# Allegro board 0010.brd
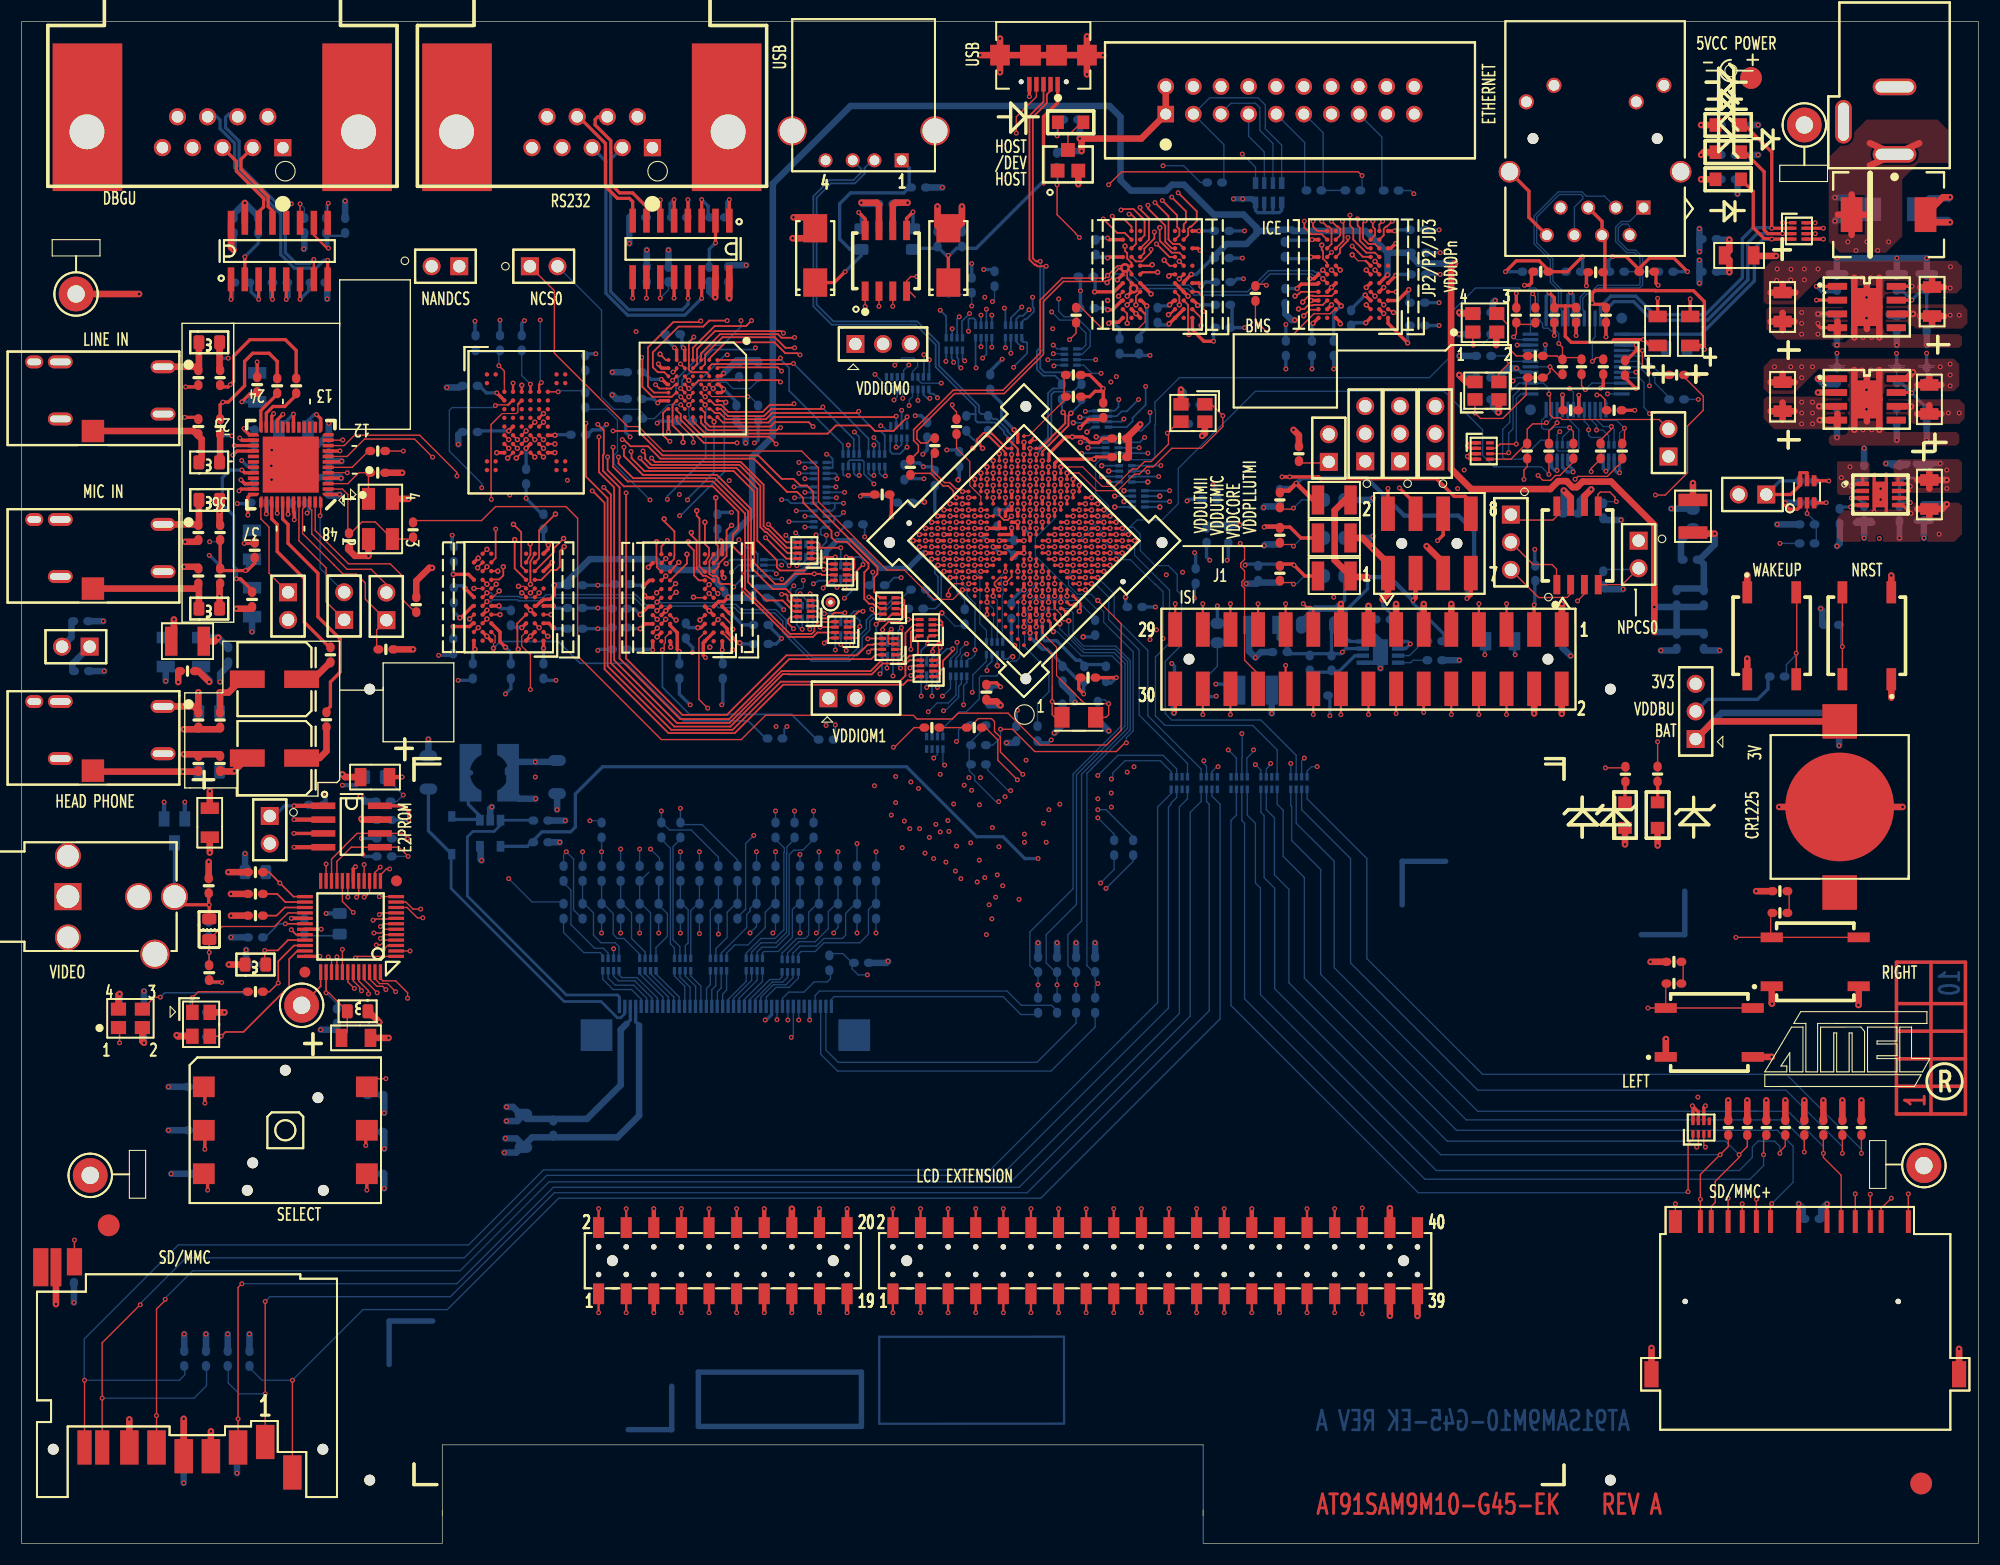
[diagram p0: board, top side]
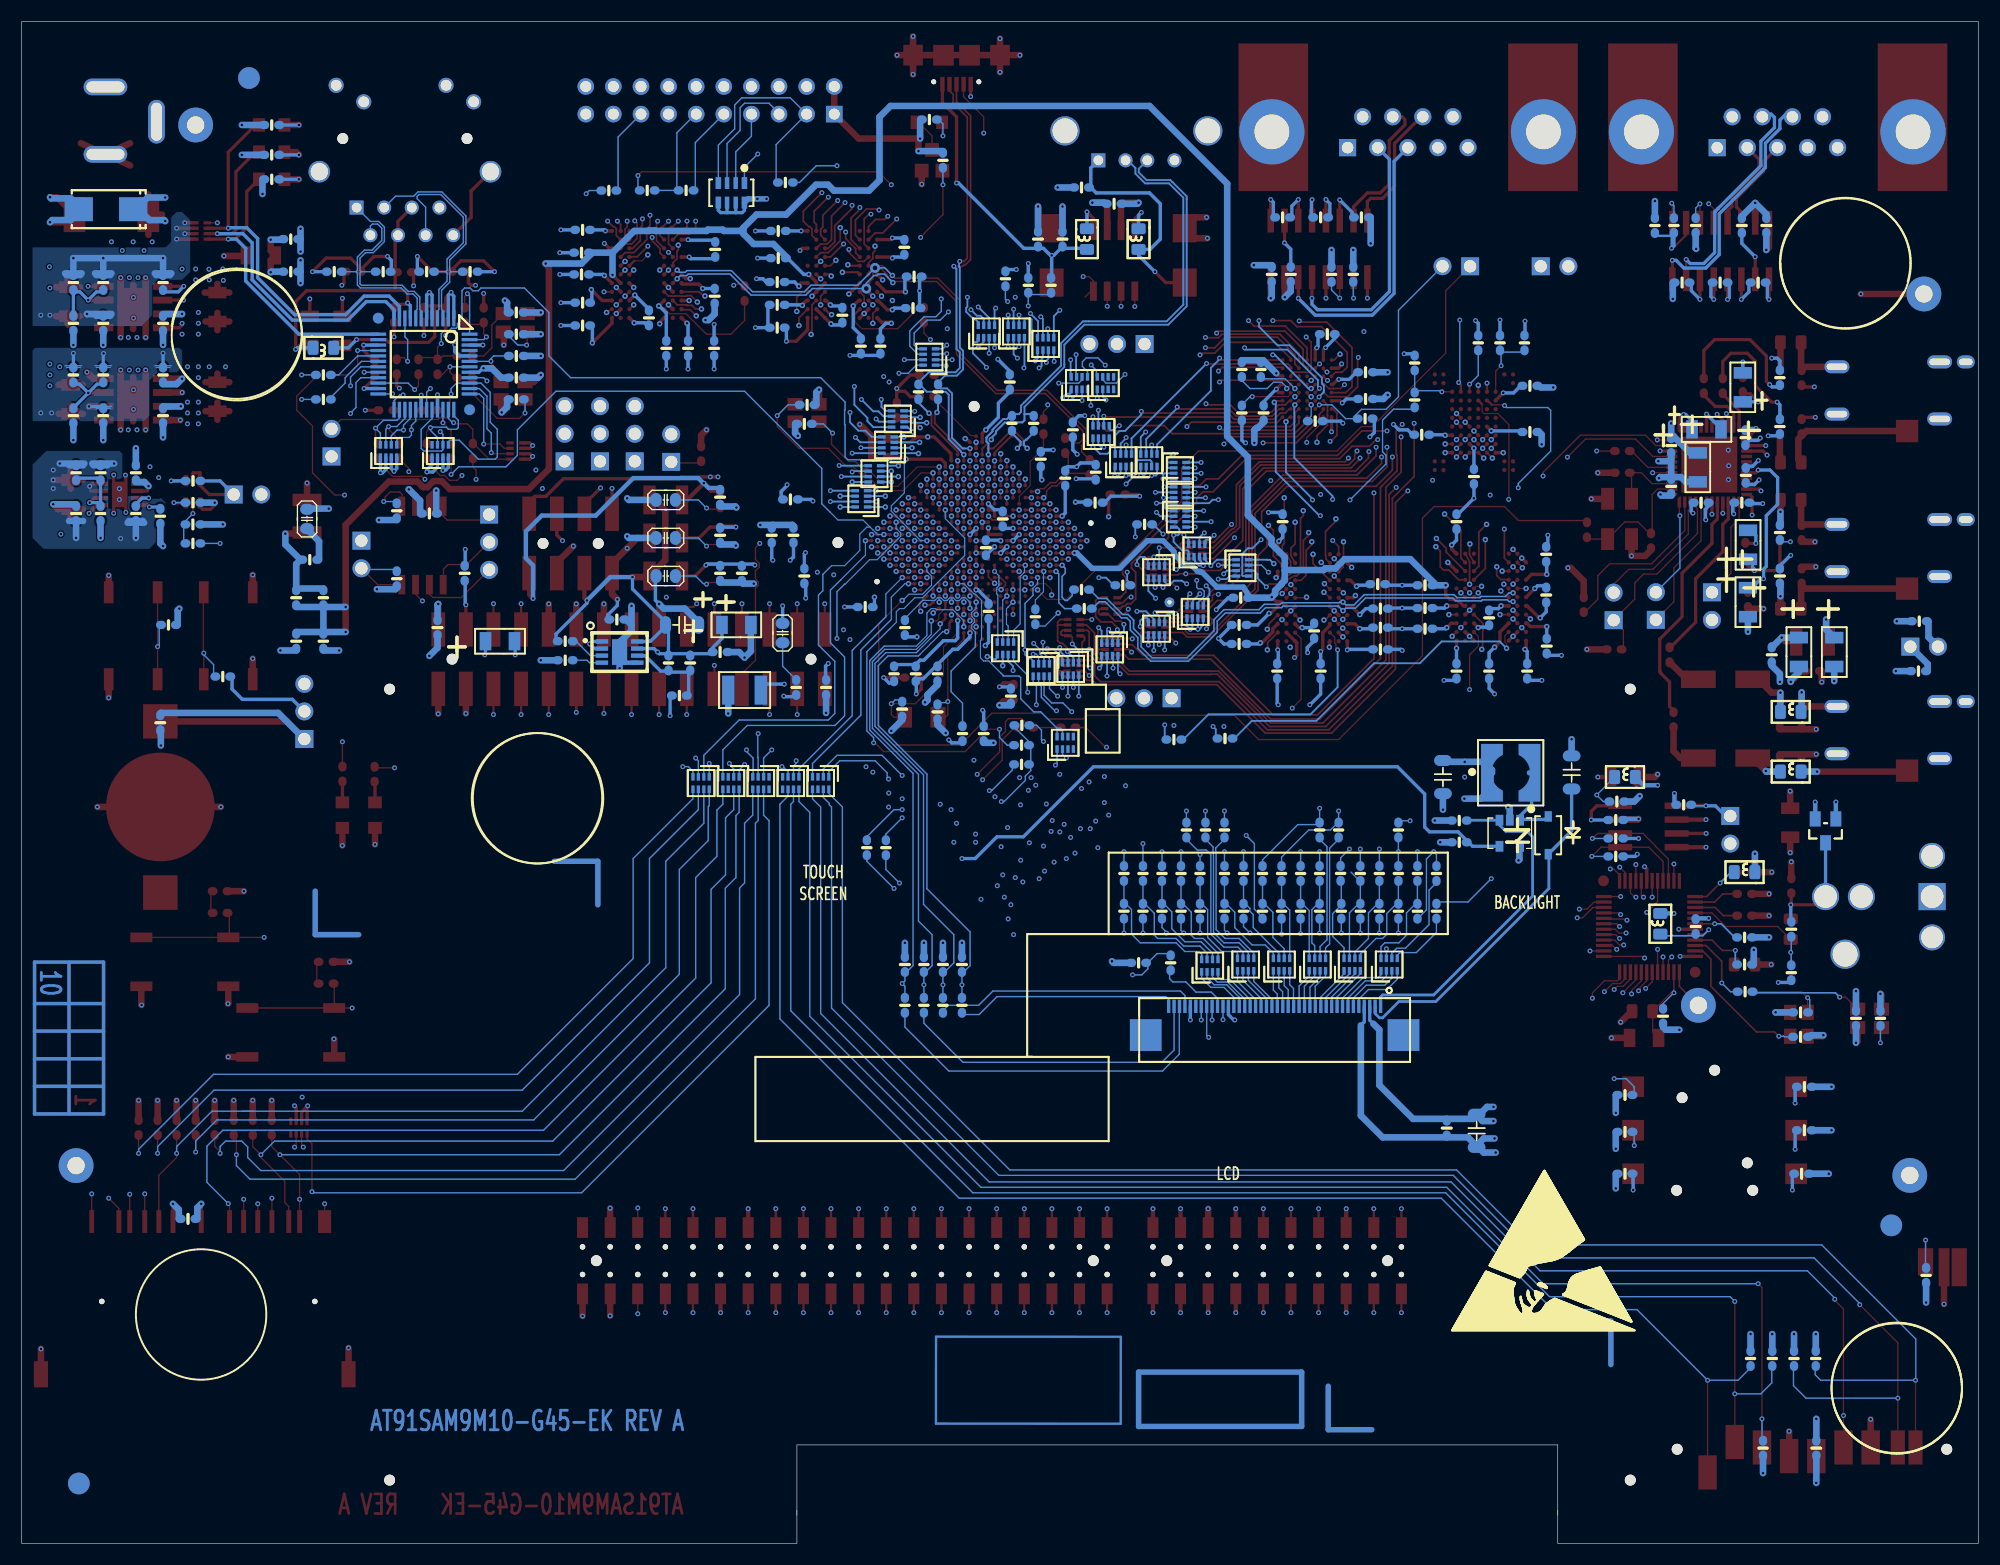
[diagram p1: board, bottom side, seen from below]

Outline 180 x 140 mm; copper layers: TOP, LAYER2, LAYER3, LAYER4, LAYER5, LAYER6, LAYER7, LAYER8, LAYER9, BOTTOM. Coordinates in mm from the lower left corner of the outline.
Outline path: 38.69,3.05 38.69,0 0,0 0,140 180,140 180,0 108.68,0 108.68,3.05

## Design rules (mm)
constraint set DEFAULT: min track width 0.3
net group ALIM_PH: nets VDDIOP2 VDDUTMII
net group DQM: nets EBI1_DQM0 EBI1_DQM1
net group RX: nets PA8 PA9
net group 0MM75: nets N16779104 N16779117 N16779201 N16779210 N16779236 N16779312 N16789903 N16858559 N16859445 N16860053 N16861331 N16862624 N16863932 PA1 PA2 PA3 PA4 PA5 PA22 PA23 PA24 PA25 PA26 PA27 PA29 PA30
net group ALIM_SP: nets AVDD_AC97 VDDANA VDDBU VDDCORE VDDIOM0 VDDIOM1 VDDIOP0 VDDIOP1 VDDOSC VDDPLLA VDDPLLUTMI VDDUTMIC
net group CLOCK: nets N16828912 N16828935 N17912273 N17912275 N18417476 N18417478 N32217063 N32217100 N32217772 N32218097 PA0 PA17 PA28 PA31 PE5 PE31
net group DQ: nets EBI1_DDR_D0 EBI1_DDR_D1 EBI1_DDR_D2 EBI1_DDR_D3 EBI1_DDR_D4 EBI1_DDR_D5 EBI1_DDR_D6 EBI1_DDR_D7 EBI1_DDR_D8 EBI1_DDR_D9 EBI1_DDR_D10 EBI1_DDR_D11 EBI1_DDR_D12 EBI1_DDR_D13 EBI1_DDR_D14 EBI1_DDR_D15
net group DQS: nets DQS0_EBI1 DQS1_EBI1 EBI1_DQS0 EBI1_DQS1
net group ISO_DIFF: nets CLK_EBI1 DDR_CLK DDR_NCLK EBI0_CLK EBI0_NCLK EBI1_NSDCK EBI1_SDCK HDMA HDMB HDPA HDPB N18231972 N18233085 N18236424 N18237537 NCLK_EBI1
net group PAIR_DIFF_ETH: nets N32217028 N32217030 N32217124
net group SIG_MEM_60R: nets DDR_A0 DDR_A1 DDR_A2 DDR_A3 DDR_A4 DDR_A5 DDR_A6 DDR_A7 DDR_A8 DDR_A9 DDR_A10 DDR_A11 DDR_A12 DDR_A13 DDR_D0 DDR_D1 DDR_D2 DDR_D3 DDR_D4 DDR_D5 DDR_D6 DDR_D7 DDR_D8 DDR_D9 DDR_D10 DDR_D11 DDR_D12 DDR_D13 DDR_D14 DDR_D15 EBI0_A0 EBI0_A1 EBI0_A2 EBI0_A3 EBI0_A4 EBI0_A5 EBI0_A6 EBI0_A7 EBI0_A8 EBI0_A9 EBI0_A10 EBI0_A11 EBI0_A12 EBI0_A13 EBI0_D0 EBI0_D1 EBI0_D2 EBI0_D3 EBI0_D4 EBI0_D5 EBI0_D6 EBI0_D7 EBI0_D8 EBI0_D9 EBI0_D10 EBI0_D11 EBI0_D12 EBI0_D13 EBI0_D14 EBI0_D15 EBI1_A1 EBI1_A2 EBI1_A3 EBI1_A4 EBI1_A5 EBI1_A6 EBI1_A7 EBI1_A8 EBI1_A9 EBI1_A10 EBI1_A11 EBI1_A12 EBI1_A13 EBI1_A14 EBI1_A15 EBI1_A16 EBI1_A17 EBI1_A18 EBI1_D0 EBI1_D1 EBI1_D2 EBI1_D3 EBI1_D4 EBI1_D5 EBI1_D6 EBI1_D7 EBI1_D8 EBI1_D9 EBI1_D10 EBI1_D11 EBI1_D12 EBI1_D13 EBI1_D14 EBI1_D15 EBI1_DDR_A2 EBI1_DDR_A3 EBI1_DDR_A4 EBI1_DDR_A5 EBI1_DDR_A6 EBI1_DDR_A7 EBI1_DDR_A8 EBI1_DDR_A9 EBI1_DDR_A10 EBI1_DDR_A11 EBI1_DDR_A12 EBI1_DDR_A13 EBI1_FLASH_A1 EBI1_FLASH_A2 EBI1_FLASH_A3 EBI1_FLASH_A4 EBI1_FLASH_A5 EBI1_FLASH_A6 EBI1_FLASH_A7 EBI1_FLASH_A8 EBI1_FLASH_A9 EBI1_FLASH_A10 EBI1_FLASH_A11 EBI1_FLASH_A12 EBI1_FLASH_A13 EBI1_FLASH_A14 EBI1_FLASH_A15 EBI1_FLASH_A16 EBI1_FLASH_A17 EBI1_FLASH_A18 EBI1_FLASH_A19 EBI1_FLASH_A20 EBI1_FLASH_A21 EBI1_FLASH_D0 EBI1_FLASH_D1 EBI1_FLASH_D2 EBI1_FLASH_D3 EBI1_FLASH_D4 EBI1_FLASH_D5 EBI1_FLASH_D6 EBI1_FLASH_D7 EBI1_FLASH_D8 EBI1_FLASH_D9 EBI1_FLASH_D10 EBI1_FLASH_D11 EBI1_FLASH_D12 EBI1_FLASH_D13 EBI1_FLASH_D14 EBI1_FLASH_D15 EBI1_NAND_FSH_D0 EBI1_NAND_FSH_D1 EBI1_NAND_FSH_D2 EBI1_NAND_FSH_D3 EBI1_NAND_FSH_D4 EBI1_NAND_FSH_D5 EBI1_NAND_FSH_D6 EBI1_NAND_FSH_D7 EBI1_NAND_FSH_D8 EBI1_NAND_FSH_D9 EBI1_NAND_FSH_D10 EBI1_NAND_FSH_D11 EBI1_NAND_FSH_D12 EBI1_NAND_FSH_D13 EBI1_NAND_FSH_D14 EBI1_NAND_FSH_D15
net group TX: nets PA6 PA7 PA10 PA11

## Placement (name value [footprint] x y rotation side)
BP1  Switch  [A06-H-E_138]  169.75 83.5 180 top
BP2  Switch  [A06-H-E_138]  161 83.5 0 top
BP3  JoyStick  [BP_KNITTER_TSSJ30]  24.25 38 90 top
BP4  Switch  [A06-H-E_138]  165 53.5 90 top
BP5  Switch  [A06-H-E_138]  155.25 47 90 top
C1  100n  [C0603_PC]  106 78.75 270 bottom
C2  4.7u  [C0805_PC]  110 83.75 270 bottom
C3  10n  [C0603_PC]  172.5 116 90 bottom
C4  33u  [C_6032]  172.25 122.75 0 bottom
C5  10n  [C0603_PC]  172.75 98.5 90 bottom
C6  10u  [CE1206]  175.5 96.5 270 top
C7  1u  [C0603_PC]  175 94.75 270 bottom
C8  100n  [C0603_PC]  115.75 92.75 270 bottom
C9  10u  [CE1206]  162 113.75 90 top
C10  1u  [C0603_PC]  167 112.25 90 bottom
C11  1u  [C0603_PC]  172.5 112.25 90 bottom
C12  10u  [CE1206]  175.75 114.25 90 top
C13  1u  [C0603_PC]  169.5 98.5 270 bottom
C14  4.7u  [C0805_PC]  120.75 92.5 180 bottom
C15  2.2u  [C1206_PC]  119.25 84.5 180 bottom
C16  10n  [C0603_PC]  172.5 107.5 90 bottom
C17  15p  [C0603_PC]  164.25 93.75 0 bottom
C18  100n  [C0603_PC]  115.75 96.25 270 bottom
C19  10n  [C0603_PC]  118.5 81 90 bottom
C20  4.7u  [C0805_PC]  120.75 96 180 bottom
C21  10u  [CE1206]  114.25 84.5 180 bottom
C22  1u  [C0603_PC]  115.75 82 0 bottom
C23  10u  [CE1206]  162 105.5 90 top
C24  1u  [C0603_PC]  167 103.75 90 bottom
C25  1u  [C0603_PC]  125.25 85 0 bottom
C26  1u  [C0603_PC]  172.5 103.75 90 bottom
C27  10u  [CE1206]  175.5 105.25 90 top
C28  100n  [C0603_PC]  113.75 89.25 270 bottom
C29  4.7u  [C0805_PC]  120.75 89 180 bottom
C30  100n  [C0603_PC]  167.25 75.5 90 bottom
C31  10n  [C0603_PC]  161.75 60 0 top
C32  10n  [C0603_PC]  32.5 41.25 0 bottom
C33  10n  [C0603_PC]  16 38 180 bottom
C34  10n  [C0603_PC]  16.25 34 180 bottom
C35  10n  [C0603_PC]  32.5 34 0 bottom
C36  10n  [C0603_PC]  32.5 37.85 0 bottom
C37  10n  [C0603_PC]  152 53.5 0 top
C38  100n  [C0603_PC]  101 99.95 0 top
C39  100n  [C0603_PC]  89.1 106.85 90 bottom
C40  100n  [C0603_PC]  91.5 74.5 270 bottom
C41  100n  [C0603_PC]  99.5 104.25 90 top
C42  100n  [C0603_PC]  111 92.75 90 bottom
C43  100n  [C0603_PC]  109 92.75 90 bottom
C44  100n  [C0603_PC]  109.28 96.05 180 bottom
C45  100n  [C0603_PC]  102.4 86.15 0 bottom
C46  22p  [C0603_PC]  108 103 180 bottom
C47  100n  [C0603_PC]  101 101.65 0 top
C48  100n  [C0603_PC]  79.16 96.5 180 top
C49  100n  [C0603_PC]  108 89 90 bottom
C50  22p  [C0603_PC]  107.75 104.75 0 bottom
C51  100n  [C0603_PC]  91.3 91.6 270 bottom
C52  100n  [C0603_PC]  84 98 90 bottom
C53  15p  [C0603_PC]  95.75 76.5 90 bottom
C54  100n  [C0603_PC]  89.75 94.25 270 bottom
C55  100n  [C0603_PC]  83.3 102.45 90 bottom
C56  100n  [C0603_PC]  81.2 98.55 90 bottom
C57  15p  [C0603_PC]  99 76.75 90 bottom
C58  100n  [C0603_PC]  86.25 99.75 90 bottom
C59  100n  [C0603_PC]  88.74 78.31 270 top
C60  100n  [C0603_PC]  89 77.95 270 bottom
C61  100n  [C0603_PC]  91.05 85.75 270 bottom
C62  100n  [C0603_PC]  81.25 95.75 180 bottom
C63  100n  [C0603_PC]  115.75 89.25 270 bottom
C64  100n  [C0603_PC]  98.1 79.65 0 top
C65  100n  [C0603_PC]  97.75 80 90 bottom
C66  10p  [C0603_PC]  96.75 105.5 0 top
C67  100n  [C0603_PC]  98.8 119.25 90 bottom
C68  100n  [C0603_PC]  128.4 120.85 0 bottom
C69  100n  [C0603_PC]  104.5 113 270 bottom
C70  100n  [C0603_PC]  128.5 116.75 0 bottom
C71  100n  [C0603_PC]  97.9 116.55 180 bottom
C72  100n  [C0603_PC]  128.4 114.15 0 bottom
C73  100n  [C0603_PC]  98 113.65 180 bottom
C74  100n  [C0603_PC]  128.4 112.05 0 bottom
C75  100n  [C0603_PC]  101 110.15 270 bottom
C76  100n  [C0603_PC]  120.7 109.95 270 bottom
C77  100n  [C0603_PC]  102.8 110.15 270 bottom
C78  100n  [C0603_PC]  116.25 114.75 270 bottom
C79  100n  [C0603_PC]  110.5 116.05 0 bottom
C80  100n  [C0603_PC]  116.3 109.95 270 bottom
C81  100n  [C0603_PC]  110.5 111.85 0 bottom
C82  100n  [C0603_PC]  118.7 109.95 270 bottom
C83  100n  [C0603_PC]  110.5 113.95 0 bottom
C84  100n  [C0603_PC]  116.2 119.05 90 bottom
C85  100n  [C0603_PC]  110.4 120.75 0 bottom
C86  100n  [C0603_PC]  122.3 112.75 270 bottom
C87  100n  [C0603_PC]  110.4 118.25 0 bottom
C88  100n  [C0603_PC]  128.5 118.75 0 bottom
C89  100n  [C0603_PC]  154.75 87 270 bottom
C90  4.7u  [C0805_PC]  153.75 94.25 90 bottom
C91  100n  [C0603_PC]  154.75 83 270 bottom
C92  100n  [C0603_PC]  45 80.25 270 bottom
C93  100n  [C0603_PC]  64 94 90 bottom
C94  100n  [C0603_PC]  55 84.25 180 bottom
C95  100n  [C0603_PC]  68 82.75 0 bottom
C96  100n  [C0603_PC]  41.5 80.25 270 bottom
C97  100n  [C0603_PC]  60.5 80.25 270 bottom
C98  100n  [C0603_PC]  55 86 180 bottom
C99  100n  [C0603_PC]  64.5 80.25 270 bottom
C100  100n  [C0603_PC]  39.75 91 90 bottom
C101  100n  [C0603_PC]  55 82.25 180 bottom
C102  100n  [C0603_PC]  39.75 87.25 90 bottom
C103  100n  [C0603_PC]  48 94 90 bottom
C104  100n  [C0603_PC]  55.25 88.25 180 bottom
C105  100n  [C0603_PC]  68 84.5 0 bottom
C106  100n  [C0603_PC]  39.7 82.55 270 bottom
C107  100n  [C0603_PC]  50.9 84.15 0 bottom
C108  100n  [C0603_PC]  48 80.25 270 bottom
C109  100n  [C0603_PC]  50.9 86.05 0 bottom
C110  100n  [C0603_PC]  65.75 104 270 bottom
C111  100n  [C0603_PC]  45 85.15 90 bottom
C112  100n  [C0603_PC]  61.1 83.95 270 bottom
C113  100n  [C0603_PC]  59.89 111.25 180 bottom
C114  100n  [C0603_PC]  56.37 107.75 180 bottom
C115  100n  [C0603_PC]  56.37 105.29 180 bottom
C116  100n  [C0603_PC]  50.9 88.15 0 bottom
C117  100n  [C0603_PC]  67.85 87 0 bottom
C118  100n  [C0603_PC]  41.25 102.25 180 bottom
C119  100n  [C0603_PC]  41.25 106.5 180 bottom
C120  100n  [C0603_PC]  51.2 102 0 bottom
C121  100n  [C0603_PC]  46.4 98.15 270 bottom
C122  100n  [C0603_PC]  14.9 8.75 270 bottom
C123  100n  [C0603_PC]  164.7 29.85 0 bottom
C124  100n  [C0603_PC]  142.5 94.75 0 bottom
C125  100n  [C0603_PC]  33.35 66.55 180 bottom
C126  100u/6.3V  [C_PANASONIC_FK_D]  23.25 72.25 180 top
C127  100u/6.3V  [C_PANASONIC_FK_D]  23.25 79.5 180 top
C128  470p  [C0603_PC]  16.25 71.75 90 top
C129  470p  [C0603_PC]  16.25 75.75 270 top
C130  100n  [C0603_PC]  21.75 95.75 180 bottom
C131  100n  [C0603_PC]  25.5 95.75 0 bottom
C132  10u  [CE1206]  25 102.5 180 bottom
C133  22p  [C0603_PC]  30.11 92.25 90 top
C134  10u  [CE1206]  25.8 98.99 270 bottom
C135  100n  [C0603_PC]  28.25 101 270 bottom
C136  100n  [C0603_PC]  28.25 97.25 90 bottom
C137  22p  [C0603_PC]  32.75 98.5 180 top
C138  100n  [C0603_PC]  21.42 101.73 270 bottom
C139  100n  [C0603_PC]  21.66 106.61 90 top
C140  10u  [CE1206]  21.66 106.36 90 bottom
C141  100n  [C0603_PC]  21.43 91.37 90 top
C142  10u  [CE1206]  21.18 91.87 90 bottom
C143  100n  [C0603_PC]  21.19 86.84 270 top
C144  10u  [CE1206]  21.19 86.59 270 bottom
C145  100n  [C0603_PC]  21.39 98.26 270 bottom
C146  1u  [C0603_PC]  23.5 106.5 90 top
C147  1u  [C0603_PC]  25.25 106.5 90 top
C148  470p  [C0603_PC]  16.25 102.75 90 top
C149  470p  [C0603_PC]  16.25 107.25 270 top
C150  1u  [C0603_PC]  18.25 89 270 bottom
C151  1u  [C0603_PC]  18.25 93 90 bottom
C152  10u  [CE1206]  16.5 82 270 bottom
C153  100n  [C0603_PC]  19 81.75 270 bottom
C154  10u  [CE1206]  13.25 82 270 bottom
C155  470p  [C0603_PC]  16.25 89 90 top
C156  470p  [C0603_PC]  16.25 93 270 top
C157  100n  [C0603_PC]  21.75 121.25 90 bottom
C158  100n  [C0603_PC]  19.5 121.25 90 bottom
C159  100n  [C0603_PC]  20.25 116 0 bottom
C160  100n  [C0603_PC]  64 122 180 bottom
C161  100n  [C0603_PC]  65 116.75 90 bottom
C162  100n  [C0603_PC]  63.25 116.75 270 bottom
C163  100n  [C0603_PC]  23.75 116 0 bottom
C164  100n  [C0603_PC]  60.5 122 180 bottom
C165  100n  [C0603_PC]  27.25 116 0 bottom
C166  100n  [C0603_PC]  56.75 122 180 bottom
C167  100n  [C0603_PC]  82.5 124.75 0 bottom
C168  33u  [C_6032]  73 118.5 90 top
C169  100n  [C0603_PC]  79.5 123.25 0 bottom
C170  33u  [C_6032]  85.25 118.5 90 top
C171  10p  [C0603_PC]  86.5 120 90 bottom
C172  100n  [C0603_PC]  84.25 120 90 bottom
C173  100n  [C0603_PC]  134.5 113.25 0 bottom
C174  22p  [C0603_PC]  134.5 105.25 180 bottom
C175  22p  [C0603_PC]  134.5 109.25 0 bottom
C176  100n  [C0603_PC]  149.5 117 0 top
C177  100n  [C0603_PC]  143 113 270 top
C178  100n  [C0603_PC]  144.8 116.95 180 top
C179  100n  [C0603_PC]  141 113 270 top
C180  10u  [CE1206]  150.5 111.55 90 top
C181  10u  [CE1206]  153.5 111.55 90 top
C182  100n  [C0603_PC]  145.75 113 270 top
C183  100n  [C0603_PC]  139.75 117 180 top
C184  100n  [C0603_PC]  134.5 107.25 0 bottom
C185  100n  [C0603_PC]  142.5 104.25 0 top
C186  100n  [C0603_PC]  147.5 108.15 270 top
C187  10u  [CE1206]  158 118.5 180 top
C188  100n  [C0603_PC]  48.9 38.2 90 bottom
C189  10u  [C1206_PC]  46.15 37.95 90 bottom
C190  10u  [C1206_PC]  49.25 70.5 270 bottom
C191  2.2u  [C1206_PC]  37.41 70.93 90 bottom
C192  10n  [C0603_PC]  98.75 53.25 90 bottom
C193  10n  [C0603_PC]  93.5 53.25 90 bottom
C194  10n  [C0603_PC]  95.25 53.25 90 bottom
C196  100n  [C0603_PC]  33.25 68.25 180 bottom
C197  100n  [C0603_PC]  29 48.5 270 bottom
C198  10u  [CE1206]  30.75 46.5 0 top
C199  10u  [CE1206]  32.5 70.5 180 top
C200  100n  [C0603_PC]  26 56.75 90 bottom
C201  10u  [CE1206]  17.3 66.3 270 top
C202  100n  [C0603_PC]  21.5 53.25 180 bottom
C203  100n  [C0603_PC]  21.5 61.75 180 top
C204  33p  [C0603_PC]  17.2 56.5 90 bottom
C205  100p  [C0603_PC]  17.25 52.5 270 top
C206  100p  [C0603_PC]  17.2 60.5 90 top
C207  100n  [C0603_PC]  11.25 48.3 270 bottom
C208  10p  [C0603_PC]  16.35 48.85 0 bottom
C209  10p  [C0603_PC]  16.35 46.6 180 bottom
C210  100n  [C0603_PC]  139.25 89.25 90 bottom
C211  10u  [CE1206]  136 83 180 bottom
C212  100n  [C0603_PC]  141.75 84.25 270 bottom
CR1  5V  [CRS_DO214AB_01]  171.75 122.25 0 top
D1  Green  [LED0805]  147.5 67 0 top
D2  Green  [LED0805]  150.5 67 0 top
D3  Red  [LED0805]  96.5 130.75 270 top
D4  Yellow  [LED0805]  157 130.5 270 top
D5  Green  [LED0805]  157 128 270 top
D6  Green  [LED0805]  157 125.5 270 top
D7  RB160M-60  [SOD-123]  39.56 65.14 270 bottom
D8  BAT54SLT1G  [SOT23]  14.05 65.55 0 bottom
J1  TSM-104-01-LM-DV-TR  [CON_SAMTEC_TSM_104_01_DV_A]  129.5 92 0 top
J2  DC POWER JACK  [CON_3_WDC001_575]  172.3 127.8 0 top
J3  BatteryHolder  [PILE_KEYSTONE_3000_DIA12MM0]  167.25 67.75 270 top
J5  7SDMM-B0-2211  [CON_KINGCONN_7SDMM_2211]  164.09 22.25 0 top
J6  FPS009-3202-BL  [CON_FPS_SDCARD_009_3202]  15.2 14.5 0 top
J7  STEREO_3.5mm  [CON_JACK_KLBR-4J]  13 77 270 top
J8  STEREO_3.5mm  [CON_JACK_KLBR-4J]  13 108.25 270 top
J9  STEREO_3.5mm  [CON_JACK_KLBR-4J]  13 93.75 270 top
J10  DB9M_R  [SUBD9M]  24.02 128.45 0 top
J11  DB9M_R  [SUBD9M]  58.02 128.45 0 top
J12  G3505-4NBT1S1W  [CON_AMP_787616]  77.45 127.25 180 top
J13  HTST-110-01-SM-D  [HE10M2X10TH]  105.25 131.5 0 top
J14  G3515-09010101-00  [USBCONN_5SM_315X217_118]  94 134.25 180 top
J15  J00-0061NL  [CON_RJ45_J00_00XX_SHIELD]  144.75 129.25 180 top
J17  HDR_2x15_SMT  [CON_SAMTEC_TSM_115_01_DV_A]  123.9 81.35 180 top
J18  HDR_2x10_SMT  [CON_SAMTEC_SSM_110_X_DV]  64.5 26 0 top
J20  RCA JACk  [JACK2P_815X512_728]  7.25 59.5 90 top
J23  HDR_2x20_SMT  [CON_SAMTEC_SSM_120_X_DV]  104.28 26 0 top
J24  FPC_top_40pins  [CON_LCD_TFT1N4633_40]  54.98 57.4 180 bottom
JP1  SIP3  [BAR3PTS02]  123.6 99.55 90 top
JP2  SIP3  [BAR3PTS02]  126.8 99.55 90 top
JP3  SIP3  [BAR3PTS02]  130.05 99.55 90 top
JP4  SIP2  [BAR2PTS02]  160.5 96.5 90 top
JP5  SIP3  [BAR3PTS02]  76.7 110.35 0 top
JP6  SIP3  [BAR3PTS02]  74.22 77.75 0 top
JP7  SIP3  [BAR3PTS02]  154 74 90 top
JP8  SIP2  [BAR2PTS02]  120.25 99.5 0 top
JP9  SIP2  [BAR2PTS02]  46.75 117.5 270 top
JP10  SIP2  [BAR2PTS02]  40.25 117.5 90 top
JP11  SIP3  [BAR3PTS02]  137 94.65 270 top
JP12  SIP2  [BAR2PTS02]  148.75 92.25 180 top
JP13  SIP2  [BAR2PTS02]  22.82 66.92 180 top
JP14  SIP2  [BAR2PTS02]  24.5 87.5 180 top
JP15  SIP2  [BAR2PTS02]  6.25 82.5 90 top
JP16  SIP2  [BAR2PTS02]  151.5 100 0 top
JP17  SIP2  [BAR2PTS02]  29.66 84.97 0 top
JP18  SIP2  [BAR2PTS02]  33.55 84.93 0 top
L1  10uH  [L1210]  113.5 78.5 270 bottom
L2  10uH  [L1210]  120.75 92.5 90 top
L3  10uH  [L1210]  120.75 96 90 top
L4  10uH  [L1210]  120.75 89 90 top
L5  10uH  [L1210]  153.75 94.5 180 top
L6  220ohm at 100MHz  [FB0805_PC]  17.25 71 180 bottom
L7  220ohm at 100MHz  [FB0805_PC]  17.25 76.5 180 bottom
L8  220ohm at 100MHz  [FB0805_PC]  17.24 99.45 180 top
L9  220ohm at 100MHz  [FB0805_PC]  17.25 110.5 180 top
L10  220ohm at 100MHz  [FB0805_PC]  17.25 86 180 top
L11  10uH  [L1210]  15.25 83 90 top
L12  220ohm at 100MHz  [FB0805_PC]  17.25 96 180 top
L13  220ohm at 100MHz  [FB0805_PC]  77.25 120 90 bottom
L14  220ohm at 100MHz  [FB0805_PC]  82 120 90 bottom
L15  2200R  [FB0805_PC]  152.25 110 0 bottom
L16  22uH  [4_8X4_8]  43.01 70.89 90 bottom
L17  2200R  [FB0805_PC]  30.9 48.95 0 top
L18  2200R  [FB0805_PC]  32.5 70.5 180 bottom
L19  2200R  [FB0805_PC]  29.25 57 90 bottom
L20  2200R  [FB0805_PC]  21.5 53.25 180 top
L21  2200R  [FB0805_PC]  21.5 61.75 180 bottom
L22  1.8uH  [L0805_PC]  17.25 56.5 90 top
MN1  RT9186A  [VDFN_8_026_120X120_39]  171 96.5 270 top
MN2  RT9018A  [SOP_8__50_154X193_69]  169.75 113.75 270 top
MN3  RT9186A  [VDFN_8_026_120X120_39]  125 82 270 bottom
MN4  RT9018A  [SOP_8__50_154X193_69]  169.75 105.25 270 top
MN5  AT91SAM9G45  [CI_ATMEL_TFBGA324_0MM8_SOCKET6088]  92.2 92.25 135 top
MN6  MT47H64M8CF-3 -F  [CI_MICRON_FBGA60_8X10]  104.5 116.75 180 top
MN7  MT47H64M8CF-3 -F  [CI_MICRON_FBGA60_8X10]  122.5 116.75 180 top
MN8  MT47H64M8CF-3 -F  [CI_MICRON_FBGA60_8X10]  61.25 87 180 top
MN9  MT47H64M8CF-3 -F  [CI_MICRON_FBGA60_8X10]  44.8 87.05 180 top
MN10  M58WR032KT_VFBGA56  [BGA56_8X7_0295_039]  61.75 106.25 270 top
MN11  MT29F2G08ABDHC:D  [CI_MICRON_VFBGA63_0MM8]  46.4 103.15 0 top
MN12  AT24C512BN  [SO8]  30.35 65.95 270 top
MN13  AT45DB321D-SU  [SOIC8_325_0500_085]  143.13 91.81 90 top
MN14  WM9711L  [QFN48_276_0197_039]  24.75 99.25 180 top
MN15  ADM3202ARNZ  [SO16]  23.7 118.9 0 top
MN16  ADM3202ARNZ  [SO16]  60.65 119.1 180 top
MN17  AIC1526-0GS  [SOP8_244_0500_069]  79.5 118 90 top
MN18  DM9161AEP  [JEDEC_MS026_BBC_LQFP7X7_48]  143 108.5 0 bottom
MN19  CP2122ST  [SM_5_SOT23_70H]  43.1 65.33 0 bottom
MN20  CH7024B  [JEDEC_MS026_BBC_LQFP7X7_48]  30.25 56.75 90 top
NOREF  -  []  -1 -28.75 0 top
NOREF#2  -  []  0 140 0 top
NOREF#3  -  []  -10 150 0 top
NOREF#4  -  []  -87 -142.75 0 top
NOREF#5  -  []  38.69 0 90 top
NOREF#6  -  []  180 0 90 top
NOREF#7  -  [unnamed#2]  159.1 134.82 0 top
NOREF#8  -  []  38.69 0 0 top
NOREF#9  -  [unnamed#2]  174.75 5.5 0 top
NOREF#10  -  []  88 -92.75 0 top
NOREF#11  -  []  175.65 39.5 90 top
NOREF#12  -  []  -117 -112.75 0 top
NOREF#13  -  [unnamed#2]  8 29.25 0 top
NOREF#14  -  []  -192 -117.75 0 top
NOREF#15  -  []  77.25 10.75 180 bottom
NOREF#16  -  []  303 -112.75 180 bottom
NOREF#17  -  [unnamed#2]  159.1 134.82 180 bottom
NOREF#18  -  []  40.25 24 180 bottom
NOREF#19  -  [unnamed#2]  146.16 5.81 180 bottom
NOREF#20  -  []  153 55.75 180 bottom
NOREF#21  -  [unnamed#2]  146.16 78.59 180 bottom
NOREF#22  -  [unnamed#2]  32.02 78.59 180 bottom
NOREF#23  -  [unnamed#2]  32.02 5.81 180 bottom
NOREF#24  -  [unnamed#2]  174.75 5.5 180 bottom
NOREF#25  -  [unnamed#2]  8 29.25 180 bottom
NOREF#26  -  []  59.8 10.45 180 bottom
Q1  Si1563EDH  [SOT-363]  164.25 96.75 90 top
Q2  IRLML2402  [SOT23T02]  96.25 127.25 0 top
R1  1R  [R0603_PC]  108.75 78.75 270 bottom
R2  100k  [R0603_PC]  169.5 94.75 270 bottom
R3  100k  [R0603_PC]  167 116 90 bottom
R4  47k  [R0603_PC]  175.25 116 270 bottom
R5  1R  [R0603_PC]  115.75 92.75 90 top
R6  12k  [R0603_PC]  175 98.5 90 bottom
R7  15k  [R0603_PC]  175.25 112.25 270 bottom
R8  47k  [R0603_PC]  172.75 94.75 270 bottom
R9  100k  [R0603_PC]  164.25 97.75 0 bottom
R10  100k  [R0603_PC]  130 83 0 bottom
R11  100k  [R0603_PC]  167 107.5 90 bottom
R12  1R  [R0603_PC]  115.75 96 90 top
R13  100k  [R0603_PC]  130 81.25 0 bottom
R14  12k  [R0603_PC]  120.5 81 90 bottom
R15  15k  [R0603_PC]  175.25 107.5 270 bottom
R16  10k  [R0603_PC]  164.25 92 0 bottom
R17  10k  [R0603_PC]  164.25 95.75 0 bottom
R18  12k  [R0603_PC]  175.25 103.75 90 bottom
R19  47k  [R0603_PC]  119.5 78 0 bottom
R20  1R  [R0603_PC]  115.75 89.25 90 top
R21  470R  [R0603_PC]  147.54 70.76 90 top
R22  470R  [R0603_PC]  150.5 70.78 90 top
R23  100k  [R0603_PC]  161.5 79.75 180 bottom
R24  1k  [R0603_PC]  166.5 84.5 180 bottom
R25  470R  [R0603_PC]  96.5 131 180 bottom
R26  100k  [R0603_PC]  95.25 127.25 90 bottom
R27  100R  [R0603_PC]  161.75 58 180 top
R28  100R  [R0603_PC]  16 42 0 bottom
R29  100R  [R0603_PC]  152 51.5 180 top
R30  39R  [R0603_PC]  86.9 103.05 270 bottom
R31  39R  [R0603_PC]  88.9 103.05 270 bottom
R32  39R  [R0603_PC]  95.7 105.95 270 bottom
R33  39R  [R0603_PC]  97.5 105.95 270 bottom
R34  0R  [R0603_PC]  98.75 84.25 90 bottom
R35  0R  [R0603_PC]  99.75 80 90 bottom
R36  0R  [R0603_PC]  95.75 80 270 bottom
R37  6.8k  [R0603_PC]  96.75 107.5 180 top
R38  10k  [R0603_PC]  93.45 74.5 90 bottom
R39  4.7k  [R0603_PC]  117.5 100.25 90 top
R40  27R  [R0603_PC]  86 102.75 90 top
R41  27R  [R0603_PC]  86.75 85.25 270 bottom
R42  27R  [R0603_PC]  84 101 90 top
R43  27R  [R0603_PC]  82.25 86 180 bottom
R44  27R  [R0603_PC]  81.75 99 90 top
R45  27R  [R0603_PC]  82.5 87.75 180 bottom
R46  27R  [R0603_PC]  97 113 90 top
R47  27R  [R0603_PC]  74 73.95 180 bottom
R48  27R  [R0603_PC]  113.5 115 270 top
R49  27R  [R0603_PC]  69.3 74.05 180 bottom
R50  1R  [R0603_PC]  153.5 90.5 0 bottom
R51  1.5k  [R0603_PC]  152.25 87 90 bottom
R52  1.5k  [R0603_PC]  152.25 83 90 bottom
R53  100k  [R0603_PC]  67.75 104 270 bottom
R54  0R  [R0603_PC]  66 108 270 bottom
R55  100k  [R0603_PC]  61 103.25 180 bottom
R56  470k  [R0603_PC]  56.41 103.48 180 bottom
R57  0R  [R0603_PC]  78.7 88.15 180 bottom
R58  0R  [R0603_PC]  76.7 93.75 180 bottom
R59  470k  [R0603_PC]  46 110.45 270 bottom
R60  0R  [R0603_PC]  51.85 105.2 90 bottom
R61  1k  [R0603_PC]  51.85 108.6 270 bottom
R62  470k  [R0603_PC]  41.75 110.45 270 bottom
R63  0R  [R0603_PC]  44 110.45 270 bottom
R64  10k  [R0603_PC]  4.8 24.65 270 bottom
R65  10k  [R0603_PC]  19.8 8.75 270 bottom
R66  10k  [R0603_PC]  27.1 67.95 0 bottom
R67  470k  [R0603_PC]  145.5 88.75 270 bottom
R68  0R  [R0603_PC]  145.5 95 90 bottom
R69  0R  [R0603_PC]  28.03 75.78 270 top
R70  0R  [R0603_PC]  28.4 81.75 270 top
R71  47k  [R0603_PC]  18.25 71.75 270 top
R72  47k  [R0603_PC]  18.25 75.75 90 top
R73  10k  [R0603_PC]  33.5 82.25 180 top
R74  100k  [R0603_PC]  36.3 86.36 90 top
R75  0R  [R0603_PC]  36 93.25 270 top
R76  0R  [R0603_PC]  5.5 80.25 180 bottom
R77  0R  [R0603_PC]  5.43 84.84 180 bottom
R78  49.9R  [R0603_PC]  32.75 100.5 180 top
R79  8.2K  [R0603_PC]  18.25 102.75 270 top
R80  8.2K  [R0603_PC]  18.25 107.25 90 top
R81  8.2K  [R0603_PC]  18.25 102.75 90 bottom
R82  8.2K  [R0603_PC]  18.25 107.25 270 bottom
R83  680R  [R0603_PC]  18.25 89 90 top
R84  680R  [R0603_PC]  18.25 93 270 top
R85  0R  [R0603_PC]  15.25 80.25 180 top
R86  100k  [R0603_PC]  59.5 116.75 90 bottom
R87  100k  [R0603_PC]  26 121.25 270 bottom
R88  100k  [R0603_PC]  29.75 121.25 90 bottom
R89  100k  [R0603_PC]  57.5 116.75 90 bottom
R90  0R  [R0603_PC]  28 121.25 270 bottom
R91  0R  [R0603_PC]  109.75 125.21 180 bottom
R92  0R  [R0603_PC]  122.46 124.48 0 bottom
R93  0R  [R0603_PC]  125.99 124.47 0 bottom
R94  0R  [R0603_PC]  118.88 124.48 0 bottom
R95  47k  [R0603_PC]  85.3 115.75 270 bottom
R96  68k  [R0603_PC]  87.4 115.75 90 bottom
R97  47k  [R0603_PC]  89.5 116.35 270 bottom
R98  10k  [R0603_PC]  134.5 111.25 180 bottom
R99  0R  [R0603_PC]  139.25 109.25 180 top
R100  0R  [R0603_PC]  139.25 107.25 180 top
R101  0R  [R0603_PC]  141.75 108.25 270 top
R102  49.9R  [R0603_PC]  151.25 117 0 bottom
R103  0R  [R0603_PC]  152.25 105.25 180 bottom
R104  0R  [R0603_PC]  147.25 100.5 90 top
R105  0R  [R0603_PC]  145.25 100.5 90 top
R106  0R  [R0603_PC]  143.5 108.25 270 top
R107  49.9R  [R0603_PC]  146.75 117 180 bottom
R108  0R  [R0603_PC]  152.25 107.5 180 bottom
R109  0R  [R0603_PC]  140.5 100.5 90 top
R110  0R  [R0603_PC]  152.25 107.5 180 top
R111  49.9R  [R0603_PC]  138.75 117 0 bottom
R112  0R  [R0603_PC]  142.75 100.5 90 top
R113  49.9R  [R0603_PC]  142.75 117 180 bottom
R114  0R  [R0603_PC]  138.5 100.5 90 top
R115  1.5k  [R0603_PC]  146.5 104.25 180 top
R116  0R  [R0603_PC]  137.5 113 90 top
R117  6.8k  [R0603_PC]  139.25 113 270 top
R118  470R  [R0603_PC]  157 130.5 0 bottom
R119  470R  [R0603_PC]  157 127.75 0 bottom
R120  0R  [R0603_PC]  145.5 108.25 90 top
R121  470R  [R0603_PC]  157 125.5 0 bottom
R122  0R  [R0603_PC]  155.25 120 0 bottom
R123  0R  [R0603_PC]  155.25 117 180 bottom
R125  27R  [R0603_PC]  74.3 53.41 90 bottom
R126  4.7k  [R0603_PC]  77.25 53.41 180 bottom
R127  0R  [R0603_PC]  72.85 65.63 90 bottom
R128  0R  [R0603_PC]  71.1 65.63 90 bottom
R129  0R  [R0603_PC]  69.35 65.63 90 bottom
R130  0R  [R0603_PC]  60.6 65.63 90 bottom
R131  0R  [R0603_PC]  58.85 65.63 90 bottom
R132  0R  [R0603_PC]  53.35 65.63 270 bottom
R133  0R  [R0603_PC]  49.85 61.63 90 bottom
R134  0R  [R0603_PC]  49.85 58.16 90 bottom
R136  0R  [R0603_PC]  78.6 61.63 90 bottom
R137  0R  [R0603_PC]  78.6 58.16 270 bottom
R138  0R  [R0603_PC]  76.85 61.63 90 bottom
R139  0R  [R0603_PC]  76.85 58.16 270 bottom
R140  0R  [R0603_PC]  75.1 58.16 270 bottom
R141  0R  [R0603_PC]  75.1 61.63 90 bottom
R142  0R  [R0603_PC]  73.35 58.16 270 bottom
R143  0R  [R0603_PC]  73.35 61.63 90 bottom
R144  0R  [R0603_PC]  71.6 61.63 90 bottom
R145  0R  [R0603_PC]  71.6 58.16 270 bottom
R146  0R  [R0603_PC]  69.35 58.16 270 bottom
R147  0R  [R0603_PC]  69.35 61.63 90 bottom
R148  0R  [R0603_PC]  67.6 61.63 90 bottom
R149  0R  [R0603_PC]  67.6 58.16 270 bottom
R150  0R  [R0603_PC]  88.02 73.44 180 bottom
R151  0R  [R0603_PC]  65.85 61.63 90 bottom
R152  0R  [R0603_PC]  65.85 58.16 270 bottom
R153  0R  [R0603_PC]  97 49.5 270 bottom
R154  0R  [R0603_PC]  95.25 49.5 270 bottom
R155  0R  [R0603_PC]  64.1 61.63 90 bottom
R156  0R  [R0603_PC]  93.5 49.5 270 bottom
R157  0R  [R0603_PC]  64.1 58.16 270 bottom
R158  0R  [R0603_PC]  98.75 49.5 270 bottom
R159  0R  [R0603_PC]  62.35 61.63 90 bottom
R160  0R  [R0603_PC]  62.35 58.16 270 bottom
R161  0R  [R0603_PC]  60.6 58.16 270 bottom
R162  10k  [R0603_PC]  47.75 64.5 180 bottom
R163  0R  [R0603_PC]  60.6 61.63 90 bottom
R164  10R  [R0603_PC]  47.75 66.5 180 bottom
R165  0R  [R0603_PC]  58.6 58.16 270 bottom
R166  0R  [R0603_PC]  58.67 61.64 90 bottom
R167  0R  [R0603_PC]  56.85 58.16 270 bottom
R168  0R  [R0603_PC]  56.85 61.63 90 bottom
R169  0R  [R0603_PC]  55.1 58.16 270 bottom
R170  0R  [R0603_PC]  55.1 61.63 90 bottom
R171  0R  [R0603_PC]  53.35 61.63 90 bottom
R172  0R  [R0603_PC]  53.35 58.16 270 bottom
R173  0R  [R0603_PC]  51.6 58.16 270 bottom
R174  0R  [R0603_PC]  51.6 61.63 90 bottom
R175  0R  [R0603_PC]  102.25 64 270 bottom
R176  0R  [R0603_PC]  100.5 64 90 bottom
R178  1.2k  [R0603_PC]  21.5 55.75 180 bottom
R179  4.7k  [R0603_PC]  33.35 64.85 0 bottom
R180  4.7k  [R0603_PC]  33.35 63.2 0 bottom
R181  75R  [R0603_PC]  21.5 57.75 0 top
R182  75R  [R0603_PC]  17.2 52.5 90 bottom
R183  75R  [R0603_PC]  21.5 59.75 0 top
R184  10k  [R0603_PC]  9 48.3 270 bottom
R185  0R  [R0603_PC]  21.5 50.75 0 top
R186  0R  [R0603_PC]  21.45 50.75 0 bottom
R187  68k  [R0603_PC]  20.95 17 90 bottom
R188  68k  [R0603_PC]  18.95 17 90 bottom
R189  68k  [R0603_PC]  16.95 17 90 bottom
R190  68k  [R0603_PC]  14.95 17 90 bottom
R191  68k  [R0603_PC]  157 38.25 90 top
R192  68k  [R0603_PC]  158.75 38.25 90 top
R193  68k  [R0603_PC]  160.5 38.25 90 top
R194  68k  [R0603_PC]  162.25 38.25 90 top
R195  68k  [R0603_PC]  164 38.25 90 top
R196  68k  [R0603_PC]  165.75 38.25 90 top
R197  68k  [R0603_PC]  167.5 38.25 90 top
R198  68k  [R0603_PC]  169.25 38.25 90 top
R199  100k  [R0603_PC]  167.25 94.5 270 bottom
R200  0R  [R0603_PC]  67.75 108 270 bottom
R201  10R  [R0603_PC]  88.02 71.67 180 bottom
R202  10R  [R0603_PC]  87.99 75.26 0 bottom
R203  10R  [R0603_PC]  87.63 75.05 180 top
R204  10R  [R0603_PC]  83.73 75.05 0 top
R205  220K  [R0603_PC]  97 53.25 90 bottom
RR1  33R  [RN0402]  75.6 89.35 0 bottom
RR2  27R  [RN0402]  100.3 101.05 90 bottom
RR3  27R  [RN0402]  75.6 84.15 0 bottom
RR4  33R  [RN0402]  99.4 103.45 90 bottom
RR5  27R  [RN0402]  79.9 82.25 0 bottom
RR6  27R  [RN0402]  101.55 98.4 90 bottom
RR7  27R  [RN0402]  83.5 80.45 0 bottom
RR8  33R  [RN0402]  102.75 96.1 90 bottom
RR9  27R  [RN0402]  75.3 89.35 90 top
RR10  27R  [RN0402]  91.25 111.5 180 bottom
RR11  27R  [RN0402]  72 91.35 90 top
RR12  27R  [RN0402]  88.5 111.5 180 bottom
RR13  27R  [RN0402]  72 86 90 top
RR14  33R  [RN0402]  85.8 110.35 180 bottom
RR15  27R  [RN0402]  67.7 89.75 270 bottom
RR16  27R  [RN0402]  82.7 106.75 180 bottom
RR17  27R  [RN0402]  75.4 84.05 90 top
RR18  27R  [RN0402]  80.7 102.25 180 bottom
RR19  27R  [RN0402]  79.75 82.5 90 top
RR20  27R  [RN0402]  78.65 99.65 180 bottom
RR21  27R  [RN0402]  83.2 84.25 90 top
RR22  27R  [RN0402]  76.3 99.65 180 bottom
RR23  27R  [RN0402]  83.25 80.5 90 top
RR24  27R  [RN0402]  73.45 96.45 270 bottom
RR25  27R  [RN0402]  79.8 86.25 90 top
RR26  27R  [RN0402]  80.3 106.75 180 bottom
RR27  27R  [RN0402]  73.45 98.7 270 bottom
RR28  27R  [RN0402]  73.45 94.25 270 bottom
RR29  27R  [RN0402]  96.5 109.15 90 bottom
RR30  27R  [RN0402]  71.9 91.35 180 bottom
RR31  27R  [RN0402]  72.05 85.7 180 bottom
RR32  27R  [RN0402]  89.5 82.35 0 bottom
RR33  27R  [RN0402]  86.2 80.35 0 bottom
RR36  10k  [RN0402]  154.5 38.25 0 top
RR38  27R  [RN0402]  106.5 69.95 0 bottom
RR39  27R  [RN0402]  114.75 69.95 0 bottom
RR40  27R  [RN0402]  109.25 69.95 0 bottom
RR41  27R  [RN0402]  112 69.95 0 bottom
RR42  27R  [RN0402]  117.5 69.95 0 bottom
RR43  100k  [RN0603]  114.71 124.26 0 bottom
RR44  10k  [RN0402]  146.25 100.5 180 bottom
RR45  10k  [RN0402]  134.5 100.5 270 top
RR46  10k  [RN0402]  141.5 100.5 180 bottom
RR47  10k  [RN0402]  163.5 120.75 270 top
RR48  27R  [RN0402]  70.7 53.15 180 bottom
RR49  27R  [RN0402]  67.4 53.25 180 bottom
RR50  27R  [RN0402]  64.1 53.25 180 bottom
RR51  27R  [RN0402]  60.8 53.25 180 bottom
RR52  27R  [RN0402]  57.6 53.25 180 bottom
RR53  27R  [RN0402]  54.2 53.25 180 bottom
RR54  33R  [RN0402]  84 73.65 180 bottom
TP1  TP  [TP_KEYSTONE_5012]  164 130.5 0 top
TP2  TP  [TP_KEYSTONE_5012]  6.3 33.85 0 top
TP3  TP  [TP_KEYSTONE_5012]  175 34.75 0 top
TP4  TP  [TP_KEYSTONE_5012]  5 114.95 0 top
TP5  TP pad  [TP_0MM4_0MM9]  74.41 86.58 0 top
TP6  TP  [TP_KEYSTONE_5012]  25.75 49.5 0 top
Y1  12MHz  [OSC-7M]  107.75 104 180 top
Y2  32.768KHz  [OSC-9H]  97.25 76 180 top
Y3  24.576MHz  [XTAL4SM_197X126_035]  33 94.25 270 top
Y4  50MHz  [OSC4SM_126X98_039]  134.6 112.3 0 top
Y5  25MHz  [OSC-7M]  134.8 106.05 0 top
Y6  13MHz  [OSC4SM_126X98_039]  10 48.3 0 top
Y7  13MHz  [OSC-7M]  16.5 47.75 270 top

## Library data of the parts
BP1 BP2 BP4 BP5 = switch2
BP3 = joystick2: User Part Number: PARTNUM; Tolerance: TOLERANCE
C1 C5 C7 C8 C10 C11 C13 C16 C18 C19 C22 C24-C26 C28 C30-C38 C42 C46 C50 C53 C57 C101 C103 C105-C113 C116-C125 C128 C129 C145 C147-C149 C155-C157 C159-C161 C173 C179 C183-C186 C193 C194 C197 C205 = C0603: Tolerance: TOLERANCE; User Part Number: PARTNUM
C2 C14 C20 C29 = C0805: Tolerance: TOLERANCE; User Part Number: PARTNUM
C3 C17 C39-C41 C43-C45 C47-C49 C51 C52 C54-C56 C58-C89 C91-C100 C102 C104 C130 C131 C133 C135-C138 C141 C143 C146 C153 C158 C162-C167 C169 C171 C172 C174 C176-C178 C182 C192 C196 C200 C202 C203 C207 C210 C212 = C0603: Tolerance: 10% X7R; User Part Number: PARTNUM
C4 C126 C127 C168 C170 = CE_SMT: User Part Number: PARTNUM; Tolerance: TOLERANCE
C6 C9 C12 C21 C23 C27 C132 C134 C140 C142 C144 C152 C154 C180 C181 C187 C198 C199 C201 C211 = CE1206
C15 C191 = C1206: User Part Number: PARTNUM; Tolerance: 10% X5R; tolerance: 10% X5R
C90 = C0805: Tolerance: 10% X5R; User Part Number: PARTNUM
C114 C115 C139 C150 C151 C188 C206 = C0603: Tolerance: X7R; User Part Number: PARTNUM
C175 C204 C208 C209 = C0603: Tolerance: COG; User Part Number: PARTNUM
C189 = C1206: User Part Number: PARTNUM
C190 = C1206: User Part Number: PARTNUM; Tolerance: TOLERANCE
CR1 = TVS
D1-D6 = LED
D7 = SCH
D8 = SCH_2Series_SOT23: Tolerance: TOLERANCE; User Part Number: PARTNUM
J1 = TSM 2x4 PTS-DROIT_0: User Part Number: PARTNUM; Tolerance: TOLERANCE
J2 = DC POWER JACK
J3 = BatteryHolder: User Part Number: PARTNUM; Tolerance: TOLERANCE
J5 = SD_MMCplus: Tolerance: TOLERANCE; User Part Number: PARTNUM
J6 = SD_MMC_12pin: Tolerance: TOLERANCE; User Part Number: PARTNUM
J7-J9 = STEREO CMS
J10 J11 = DSUB9_M
J12 = USB_A: Tolerance: TOLERANCE; User Part Number: PARTNUM
J13 = HDR_2x10_TH
J14 = USB_MicroAB
J15 = J0061NL: User Part Number: PARTNUM; Tolerance: TOLERANCE
J17 = HDR_2x15_SMT: Tolerance: TOLERANCE; User Part Number: PARTNUM
J18 = HDR_2x10_SMT: User Part Number: PARTNUM; Tolerance: TOLERANCE
J20 = RCA Jack: User Part Number: PARTNUM; Tolerance: TOLERANCE
J23 = HDR_2X20_SMT: User Part Number: PARTNUM; Tolerance: TOLERANCE
J24 = FPC_40pins: User Part Number: PARTNUM; Tolerance: TOLERANCE
JP1-JP3 JP5-JP7 JP11 = SIP3-DROIT
JP4 JP8-JP10 JP12-JP18 = SIP2
L1-L5 L11 = L1206
L6-L10 L12-L15 L17-L21 = BEAD_ FERRITE: Tolerance: TOLERANCE; User Part Number: PARTNUM
L16 = L_SMT
L22 = L0805: Tolerance: TOLERANCE; User Part Number: PARTNUM
MN1 MN3 = RT9186A
MN2 MN4 = RT9018A
MN5 = AT91SAM9M10: Tolerance: TOLERANCE; User Part Number: PARTNUM
MN6-MN9 = DDRII64M8-FBGA60: Tolerance: TOLERANCE; User Part Number: PARTNUM
MN10 = M58WR032KT_VFBGA56
MN11 = NAND2G08_VFBGA63: Tolerance: TOLERANCE; User Part Number: PARTNUM
MN12 = AT24_IICflash: Tolerance: TOLERANCE; User Part Number: PARTNUM
MN13 = AT45D_SPIflash
MN14 = WM9711L_0
MN15 MN16 = ADM3202-SOIC16N: Tolerance: TOLERANCE; User Part Number: PARTNUM
MN17 = SP2526A-SO8
MN18 = DM9161AE_0: Tolerance: TOLERANCE; User Part Number: PARTNUM
MN19 = CP2122
MN20 = CH7024B: Tolerance: TOLERANCE; User Part Number: PARTNUM
Q1 = SI1563EDH
Q2 = NMOS
R1-R18 R20-R29 R34-R37 R39-R49 R60 R69 R70 R76-R78 R85-R87 R94 R100-R103 R105 R112 R113 R116 R118-R121 R125 R128 R129 R131-R134 R136-R142 R145 R149 R150 R152-R154 R159 R171-R174 R187-R205 = R0603: Tolerance: TOLERANCE; User Part Number: PARTNUM
R19 R30-R33 R38 R50 R53-R59 R61-R68 R71-R75 R79-R84 R88-R93 R95 R97-R99 R104 R106-R111 R114 R122 R123 R126 R127 R130 R143 R144 R146-R148 R151 R155-R158 R160-R170 R175 R176 R179 R180 R184-R186 = R0603: Tolerance: 5%; User Part Number: PARTNUM
R51 R52 R96 R115 R117 R181-R183 = R0603: Tolerance: 1%; User Part Number: PARTNUM
R178 = R0603: Tolerance: 1%; User Part Number: PARTNUM; tolerance: 1%
RR1-RR33 RR54 = RN0402x4: User Part Number: PARTNUM; Tolerance: TOLERANCE
RR36 RR38-RR42 RR44-RR47 = RR0402: User Part Number: PARTNUM; Tolerance: TOLERANCE
RR43 = RR0402
RR48-RR53 = RN0402: User Part Number: PARTNUM; Tolerance: TOLERANCE
TP1-TP6 = Test_Point: User Part Number: PARTNUM; Tolerance: TOLERANCE
Y1 Y5 Y7 = Crystal_4pin: Tolerance: TOLERANCE; User Part Number: PARTNUM
Y2 = Crystal
Y3 = Crystal_4pin
Y4 Y6 = Oscillator

## Footprints (pads in the part's own frame, mm; a bottom-side part is the same pattern mirrored in y, then rotated)
4_8X4_8
  custom 5.309x2.007 smd: 1(0,1.727) 2(0,-1.727)
A06-H-E_138
  rect 0.889x2.032 smd: 1(-2.25,4) 2(-2.25,-4) 3(2.25,-4) 4(2.25,4)
BAR2PTS02
  rect 1.651x1.651 hole 1.143: 1(0,0)
  round 1.651 hole 1.143: 2(0,2.54)
BAR3PTS02
  rect 1.651x1.651 hole 1.143: 1(0,0)
  round 1.651 hole 1.143: 2(2.54,0) 3(5.08,0)
BGA56_8X7_0295_039
  round 0.356 smd: A1(-2.625,2.25) A2(-1.875,2.25) A3(-1.125,2.25) A4(-0.375,2.25) A5(0.375,2.25) A6(1.125,2.25) A7(1.875,2.25) A8(2.625,2.25) B1(-2.625,1.5) B2(-1.875,1.5) B3(-1.125,1.5) B4(-0.375,1.5) B5(0.375,1.5) B6(1.125,1.5) B7(1.875,1.5) B8(2.625,1.5) C1(-2.625,0.75) C2(-1.875,0.75) C3(-1.125,0.75) C4(-0.375,0.75) C5(0.375,0.75) C6(1.125,0.75) C7(1.875,0.75) C8(2.625,0.75) D1(-2.625,0) D2(-1.875,0) D3(-1.125,0) D4(-0.375,0) D5(0.375,0) D6(1.125,0) D7(1.875,0) D8(2.625,0) E1(-2.625,-0.75) E2(-1.875,-0.75) E3(-1.125,-0.75) E4(-0.375,-0.75) E5(0.375,-0.75) E6(1.125,-0.75) E7(1.875,-0.75) E8(2.625,-0.75) F1(-2.625,-1.5) F2(-1.875,-1.5) F3(-1.125,-1.5) F4(-0.375,-1.5) F5(0.375,-1.5) F6(1.125,-1.5) F7(1.875,-1.5) F8(2.625,-1.5) G1(-2.625,-2.25) G2(-1.875,-2.25) G3(-1.125,-2.25) G4(-0.375,-2.25) G5(0.375,-2.25) G6(1.125,-2.25) G7(1.875,-2.25) G8(2.625,-2.25)
BP_KNITTER_TSSJ30
  round 1 hole 4.65x1.45 unplated: (-5.525,3.5) (-5.525,-3.5) (5.525,0)
  round 1 hole 1.6 unplated: (-3,3) (3,-3)
  rect 1.9x2 smd: 1(4,7.5) 2(0,7.5) 3(-4,7.5) 4(4,-7.5) 5(0,-7.5) 6(-4,-7.5)
C0603_PC
  oval 0.914x0.762 smd: 1(-0.686,0) 2(0.686,0)
C0805_PC
  oval 1.016x1.27 smd: 1(-0.889,0) 2(0.889,0)
C1206_PC
  oval 1.016x1.626 smd: 1(-1.524,0) 2(1.524,0)
C_6032
  rect 2.6x2.2 smd: 1(-2.5,0) 2(2.5,0)
C_PANASONIC_FK_D
  rect 3.2x1.6 smd: 1(-2.5,0) 2(2.5,0)
CE1206
  rect 1.067x1.676 smd: 1(-1.333,0) 2(1.333,0)
CI_ATMEL_TFBGA324_0MM8_SOCKET6088
  round 1 hole 1.61 unplated: (-9.11,8.863) (-9.11,-8.863) (8.615,8.863) (8.615,-8.863)
  round 0.5 hole 0.85 unplated: (-9.11,-3.783) (8.615,6.323)
  round 0.35 smd: A1(-6.8,6.8) A2(-6,6.8) A3(-5.2,6.8) A4(-4.4,6.8) A5(-3.6,6.8) A6(-2.8,6.8) A7(-2,6.8) A8(-1.2,6.8) A9(-0.4,6.8) A10(0.4,6.8) A11(1.2,6.8) A12(2,6.8) A13(2.8,6.8) A14(3.6,6.8) A15(4.4,6.8) A16(5.2,6.8) A17(6,6.8) A18(6.8,6.8) B1(-6.8,6) B2(-6,6) B3(-5.2,6) B4(-4.4,6) B5(-3.6,6) B6(-2.8,6) B7(-2,6) B8(-1.2,6) B9(-0.4,6) B10(0.4,6) B11(1.2,6) B12(2,6) B13(2.8,6) B14(3.6,6) B15(4.4,6) B16(5.2,6) B17(6,6) B18(6.8,6) C1(-6.8,5.2) C2(-6,5.2) C3(-5.2,5.2) C4(-4.4,5.2) C5(-3.6,5.2) C6(-2.8,5.2) C7(-2,5.2) C8(-1.2,5.2) C9(-0.4,5.2) C10(0.4,5.2) C11(1.2,5.2) C12(2,5.2) C13(2.8,5.2) C14(3.6,5.2) C15(4.4,5.2) C16(5.2,5.2) C17(6,5.2) C18(6.8,5.2) D1(-6.8,4.4) D2(-6,4.4) D3(-5.2,4.4) D4(-4.4,4.4) D5(-3.6,4.4) D6(-2.8,4.4) D7(-2,4.4) D8(-1.2,4.4) D9(-0.4,4.4) D10(0.4,4.4) D11(1.2,4.4) D12(2,4.4) D13(2.8,4.4) D14(3.6,4.4) D15(4.4,4.4) D16(5.2,4.4) D17(6,4.4) D18(6.8,4.4) E1(-6.8,3.6) E2(-6,3.6) E3(-5.2,3.6) E4(-4.4,3.6) E5(-3.6,3.6) E6(-2.8,3.6) E7(-2,3.6) E8(-1.2,3.6) E9(-0.4,3.6) E10(0.4,3.6) E11(1.2,3.6) E12(2,3.6) E13(2.8,3.6) E14(3.6,3.6) E15(4.4,3.6) E16(5.2,3.6) E17(6,3.6) E18(6.8,3.6) F1(-6.8,2.8) F2(-6,2.8) F3(-5.2,2.8) F4(-4.4,2.8) F5(-3.6,2.8) F6(-2.8,2.8) F7(-2,2.8) F8(-1.2,2.8) F9(-0.4,2.8) F10(0.4,2.8) F11(1.2,2.8) F12(2,2.8) F13(2.8,2.8) F14(3.6,2.8) F15(4.4,2.8) F16(5.2,2.8) F17(6,2.8) F18(6.8,2.8) G1(-6.8,2) G2(-6,2) G3(-5.2,2) G4(-4.4,2) G5(-3.6,2) G6(-2.8,2) G7(-2,2) G8(-1.2,2) G9(-0.4,2) G10(0.4,2) G11(1.2,2) G12(2,2) G13(2.8,2) G14(3.6,2) G15(4.4,2) G16(5.2,2) G17(6,2) G18(6.8,2) H1(-6.8,1.2) H2(-6,1.2) H3(-5.2,1.2) H4(-4.4,1.2) H5(-3.6,1.2) H6(-2.8,1.2) H7(-2,1.2) H8(-1.2,1.2) H9(-0.4,1.2) H10(0.4,1.2) H11(1.2,1.2) H12(2,1.2) H13(2.8,1.2) H14(3.6,1.2) H15(4.4,1.2) H16(5.2,1.2) H17(6,1.2) H18(6.8,1.2) J1(-6.8,0.4) J2(-6,0.4) J3(-5.2,0.4) J4(-4.4,0.4) J5(-3.6,0.4) J6(-2.8,0.4) J7(-2,0.4) J8(-1.2,0.4) J9(-0.4,0.4) J10(0.4,0.4) J11(1.2,0.4) J12(2,0.4) J13(2.8,0.4) J14(3.6,0.4) J15(4.4,0.4) J16(5.2,0.4) J17(6,0.4) J18(6.8,0.4) K1(-6.8,-0.4) K2(-6,-0.4) K3(-5.2,-0.4) K4(-4.4,-0.4) K5(-3.6,-0.4) K6(-2.8,-0.4) K7(-2,-0.4) K8(-1.2,-0.4) K9(-0.4,-0.4) K10(0.4,-0.4) K11(1.2,-0.4) K12(2,-0.4) K13(2.8,-0.4) K14(3.6,-0.4) K15(4.4,-0.4) K16(5.2,-0.4) K17(6,-0.4) K18(6.8,-0.4) L1(-6.8,-1.2) L2(-6,-1.2) L3(-5.2,-1.2) L4(-4.4,-1.2) L5(-3.6,-1.2) L6(-2.8,-1.2) L7(-2,-1.2) L8(-1.2,-1.2) L9(-0.4,-1.2) L10(0.4,-1.2) L11(1.2,-1.2) L12(2,-1.2) L13(2.8,-1.2) L14(3.6,-1.2) L15(4.4,-1.2) L16(5.2,-1.2) L17(6,-1.2) L18(6.8,-1.2) M1(-6.8,-2) M2(-6,-2) M3(-5.2,-2) M4(-4.4,-2) M5(-3.6,-2) M6(-2.8,-2) M7(-2,-2) M8(-1.2,-2) M9(-0.4,-2) M10(0.4,-2) M11(1.2,-2) M12(2,-2) M13(2.8,-2) M14(3.6,-2) M15(4.4,-2) M16(5.2,-2) M17(6,-2) M18(6.8,-2) N1(-6.8,-2.8) N2(-6,-2.8) N3(-5.2,-2.8) N4(-4.4,-2.8) N5(-3.6,-2.8) N6(-2.8,-2.8) N7(-2,-2.8) N8(-1.2,-2.8) N9(-0.4,-2.8) N10(0.4,-2.8) N11(1.2,-2.8) N12(2,-2.8) N13(2.8,-2.8) N14(3.6,-2.8) N15(4.4,-2.8) N16(5.2,-2.8) N17(6,-2.8) N18(6.8,-2.8) P1(-6.8,-3.6) P2(-6,-3.6) P3(-5.2,-3.6) P4(-4.4,-3.6) P5(-3.6,-3.6) P6(-2.8,-3.6) P7(-2,-3.6) P8(-1.2,-3.6) P9(-0.4,-3.6) P10(0.4,-3.6) P11(1.2,-3.6) P12(2,-3.6) P13(2.8,-3.6) P14(3.6,-3.6) P15(4.4,-3.6) P16(5.2,-3.6) P17(6,-3.6) P18(6.8,-3.6) R1(-6.8,-4.4) R2(-6,-4.4) R3(-5.2,-4.4) R4(-4.4,-4.4) R5(-3.6,-4.4) R6(-2.8,-4.4) R7(-2,-4.4) R8(-1.2,-4.4) R9(-0.4,-4.4) R10(0.4,-4.4) R11(1.2,-4.4) R12(2,-4.4) R13(2.8,-4.4) R14(3.6,-4.4) R15(4.4,-4.4) R16(5.2,-4.4) R17(6,-4.4) R18(6.8,-4.4) T1(-6.8,-5.2) T2(-6,-5.2) T3(-5.2,-5.2) T4(-4.4,-5.2) T5(-3.6,-5.2) T6(-2.8,-5.2) T7(-2,-5.2) T8(-1.2,-5.2) T9(-0.4,-5.2) T10(0.4,-5.2) T11(1.2,-5.2) T12(2,-5.2) T13(2.8,-5.2) T14(3.6,-5.2) T15(4.4,-5.2) T16(5.2,-5.2) T17(6,-5.2) T18(6.8,-5.2) U1(-6.8,-6) U2(-6,-6) U3(-5.2,-6) U4(-4.4,-6) U5(-3.6,-6) U6(-2.8,-6) U7(-2,-6) U8(-1.2,-6) U9(-0.4,-6) U10(0.4,-6) U11(1.2,-6) U12(2,-6) U13(2.8,-6) U14(3.6,-6) U15(4.4,-6) U16(5.2,-6) U17(6,-6) U18(6.8,-6) V1(-6.8,-6.8) V2(-6,-6.8) V3(-5.2,-6.8) V4(-4.4,-6.8) V5(-3.6,-6.8) V6(-2.8,-6.8) V7(-2,-6.8) V8(-1.2,-6.8) V9(-0.4,-6.8) V10(0.4,-6.8) V11(1.2,-6.8) V12(2,-6.8) V13(2.8,-6.8) V14(3.6,-6.8) V15(4.4,-6.8) V16(5.2,-6.8) V17(6,-6.8) V18(6.8,-6.8)
CI_MICRON_FBGA60_8X10
  round 0.4 smd: A1(-3.2,4) A2(-2.4,4) A3(-1.6,4) A7(1.6,4) A8(2.4,4) A9(3.2,4) B1(-3.2,3.2) B2(-2.4,3.2) B3(-1.6,3.2) B7(1.6,3.2) B8(2.4,3.2) B9(3.2,3.2) C1(-3.2,2.4) C2(-2.4,2.4) C3(-1.6,2.4) C7(1.6,2.4) C8(2.4,2.4) C9(3.2,2.4) D1(-3.2,1.6) D2(-2.4,1.6) D3(-1.6,1.6) D7(1.6,1.6) D8(2.4,1.6) D9(3.2,1.6) E1(-3.2,0.8) E2(-2.4,0.8) E3(-1.6,0.8) E7(1.6,0.8) E8(2.4,0.8) E9(3.2,0.8) F2(-2.4,0) F3(-1.6,0) F7(1.6,0) F8(2.4,0) F9(3.2,0) G1(-3.2,-0.8) G2(-2.4,-0.8) G3(-1.6,-0.8) G7(1.6,-0.8) G8(2.4,-0.8) H2(-2.4,-1.6) H3(-1.6,-1.6) H7(1.6,-1.6) H8(2.4,-1.6) H9(3.2,-1.6) J1(-3.2,-2.4) J2(-2.4,-2.4) J3(-1.6,-2.4) J7(1.6,-2.4) J8(2.4,-2.4) K2(-2.4,-3.2) K3(-1.6,-3.2) K7(1.6,-3.2) K8(2.4,-3.2) K9(3.2,-3.2) L1(-3.2,-4) L2(-2.4,-4) L3(-1.6,-4) L7(1.6,-4) L8(2.4,-4)
CI_MICRON_VFBGA63_0MM8
  round 0.4 smd: A1(-3.6,4.4) A2(-2.8,4.4) A9(2.8,4.4) A10(3.6,4.4) B1(-3.6,3.6) B9(2.8,3.6) B10(3.6,3.6) C3(-2,2.8) C4(-1.2,2.8) C5(-0.4,2.8) C6(0.4,2.8) C7(1.2,2.8) C8(2,2.8) D3(-2,2) D4(-1.2,2) D5(-0.4,2) D6(0.4,2) D7(1.2,2) D8(2,2) E3(-2,1.2) E4(-1.2,1.2) E5(-0.4,1.2) E6(0.4,1.2) E7(1.2,1.2) E8(2,1.2) F3(-2,0.4) F4(-1.2,0.4) F5(-0.4,0.4) F6(0.4,0.4) F7(1.2,0.4) F8(2,0.4) G3(-2,-0.4) G4(-1.2,-0.4) G5(-0.4,-0.4) G6(0.4,-0.4) G7(1.2,-0.4) G8(2,-0.4) H3(-2,-1.2) H4(-1.2,-1.2) H5(-0.4,-1.2) H6(0.4,-1.2) H7(1.2,-1.2) H8(2,-1.2) J3(-2,-2) J4(-1.2,-2) J5(-0.4,-2) J6(0.4,-2) J7(1.2,-2) J8(2,-2) K3(-2,-2.8) K4(-1.2,-2.8) K5(-0.4,-2.8) K6(0.4,-2.8) K7(1.2,-2.8) K8(2,-2.8) L1(-3.6,-3.6) L2(-2.8,-3.6) L9(2.8,-3.6) L10(3.6,-3.6) M1(-3.6,-4.4) M2(-2.8,-4.4) M9(2.8,-4.4) M10(3.6,-4.4)
CON_3_WDC001_575
  oval 4.013x1.524 hole 3.505x1.016: 1(0,0) 2(0,6.2)
  oval 1.524x4.013 hole 1.016x3.505: 3(-4.7,3)
CON_AMP_787616
  rect 1.29x1.29 hole 0.9: 1(-3.5,0)
  round 1.29 hole 0.9: 2(-1,0) 3(1,0) 4(3.5,0)
  round 2.69 hole 2.3: 5(-6.57,-2.71) 6(6.57,-2.71)
CON_FPS_SDCARD_009_3202
  round 1 hole 1.1 unplated: (-12.3,-5.85)
  round 1 hole 1.6 unplated: (12.5,-5.85)
  rect 1.7x3.15 smd: 1(7.2,-5.185) 2(4.7,-5.685) 3(2.2,-6.485) 4(-0.3,-6.485) 5(-2.8,-5.685) 6(-5.3,-5.685) 9(9.7,-7.985)
  rect 1.3x3.15 smd: 7(-7.8,-5.685) 8(-9.425,-5.685)
  rect 1.4x2.5 smd: 10(-10.35,11.4)
  rect 1x3.5 smd: 11(-12.05,10.9)
  rect 1.4x3.5 smd: 12(-13.45,10.9)
CON_JACK_KLBR-4J
  oval 1.194x1.651 hole 0.61x1.27: (-0.45,-11.85)
  oval 1.194x2.286 hole 0.61x1.905: 1(0,0) 3(-0.45,-9.45) 4(4.8,-9.45) 5(4.35,0)
  rect 2.057x2.057 smd: 2(5.91,-6.45)
CON_KINGCONN_7SDMM_2211
  round 0.5 hole 1 unplated: (-11.05,0) (8.55,0)
  rect 0.45x2.1 smd: 1(6.98,7.35) 2(4.6,7.35) 3(2,7.35) 4(-0.6,7.35) 5(-3.2,7.35) 6(-5.8,7.35) 7(-8.65,7.35) 8(-9.65,7.35) 9(9.48,7.35) 10(5.98,7.35) 11(3.3,7.35) 12(-4.5,7.35) 13(-7.1,7.35)
  rect 1.2x2.1 smd: 14(-11.95,7.35)
  rect 1.3x2.4 smd: 15(-14.15,-6.7) 16(14.15,-6.7)
CON_LCD_TFT1N4633_40
  rect 2.921x2.921 smd: (-21.607,-10.642) (2.107,-10.642)
  rect 0.305x1.219 smd: 1(0,-8) 2(-0.5,-8) 3(-1,-8) 4(-1.5,-8) 5(-2,-8) 6(-2.5,-8) 7(-3,-8) 8(-3.5,-8) 9(-4,-8) 10(-4.5,-8) 11(-5,-8) 12(-5.5,-8) 13(-6,-8) 14(-6.5,-8) 15(-7,-8) 16(-7.5,-8) 17(-8,-8) 18(-8.5,-8) 19(-9,-8) 20(-9.5,-8) 21(-10,-8) 22(-10.5,-8) 23(-11,-8) 24(-11.5,-8) 25(-12,-8) 26(-12.5,-8) 27(-13,-8) 28(-13.5,-8) 29(-14,-8) 30(-14.5,-8) 31(-15,-8) 32(-15.5,-8) 33(-16,-8) 34(-16.5,-8) 35(-17,-8) 36(-17.5,-8) 37(-18,-8) 38(-18.5,-8) 39(-19,-8) 40(-19.5,-8)
CON_RJ45_J00_00XX_SHIELD
  round 1.39 hole 1: (-6.325,-4.9) (-3.785,-3.38) (3.785,-4.9) (6.325,-3.38)
  round 1 hole 3.25 unplated: (-5.715,0) (5.715,0)
  rect 1.29x1.29 hole 0.9: 1(-4.445,6.35)
  round 1.29 hole 0.9: 2(-3.175,8.89) 3(-1.905,6.35) 4(-0.635,8.89) 5(0.635,6.35) 6(1.905,8.89) 7(3.175,6.35) 8(4.445,8.89)
  round 1.99 hole 1.6: 15(-7.875,3.05) 16(7.875,3.05)
CON_SAMTEC_SSM_110_X_DV
  round 0.5 hole 1 unplated: (-11.43,1.27) (-11.43,-1.27) (-8.89,1.27) (-8.89,-1.27) (-6.35,1.27) (-6.35,-1.27) (-3.81,1.27) (-3.81,-1.27) (-1.27,1.27) (-1.27,-1.27) (1.27,1.27) (1.27,-1.27) (3.81,1.27) (3.81,-1.27) (6.35,1.27) (6.35,-1.27) (8.89,1.27) (8.89,-1.27) (11.43,1.27) (11.43,-1.27)
  round 1 hole 1.19 unplated: (-10.16,0) (10.16,0)
  rect 1.016x1.905 smd: 1(-11.43,-3.048) 2(-11.43,3.048) 3(-8.89,-3.048) 4(-8.89,3.048) 5(-6.35,-3.048) 6(-6.35,3.048) 7(-3.81,-3.048) 8(-3.81,3.048) 9(-1.27,-3.048) 10(-1.27,3.048) 11(1.27,-3.048) 12(1.27,3.048) 13(3.81,-3.048) 14(3.81,3.048) 15(6.35,-3.048) 16(6.35,3.048) 17(8.89,-3.048) 18(8.89,3.048) 19(11.43,-3.048) 20(11.43,3.048)
CON_SAMTEC_SSM_120_X_DV
  round 0.5 hole 1 unplated: (-24.13,1.27) (-24.13,-1.27) (-21.59,1.27) (-21.59,-1.27) (-19.05,1.27) (-19.05,-1.27) (-16.51,1.27) (-16.51,-1.27) (-13.97,1.27) (-13.97,-1.27) (-11.43,1.27) (-11.43,-1.27) (-8.89,1.27) (-8.89,-1.27) (-6.35,1.27) (-6.35,-1.27) (-3.81,1.27) (-3.81,-1.27) (-1.27,1.27) (-1.27,-1.27) (1.27,1.27) (1.27,-1.27) (3.81,1.27) (3.81,-1.27) (6.35,1.27) (6.35,-1.27) (8.89,1.27) (8.89,-1.27) (11.43,1.27) (11.43,-1.27) (13.97,1.27) (13.97,-1.27) (16.51,1.27) (16.51,-1.27) (19.05,1.27) (19.05,-1.27) (21.59,1.27) (21.59,-1.27) (24.13,1.27) (24.13,-1.27)
  round 1 hole 1.19 unplated: (-22.86,0) (22.86,0)
  rect 1.016x1.905 smd: 1(-24.13,-3.048) 2(-24.13,3.048) 3(-21.59,-3.048) 4(-21.59,3.048) 5(-19.05,-3.048) 6(-19.05,3.048) 7(-16.51,-3.048) 8(-16.51,3.048) 9(-13.97,-3.048) 10(-13.97,3.048) 11(-11.43,-3.048) 12(-11.43,3.048) 13(-8.89,-3.048) 14(-8.89,3.048) 15(-6.35,-3.048) 16(-6.35,3.048) 17(-3.81,-3.048) 18(-3.81,3.048) 19(-1.27,-3.048) 20(-1.27,3.048) 21(1.27,-3.048) 22(1.27,3.048) 23(3.81,-3.048) 24(3.81,3.048) 25(6.35,-3.048) 26(6.35,3.048) 27(8.89,-3.048) 28(8.89,3.048) 29(11.43,-3.048) 30(11.43,3.048) 31(13.97,-3.048) 32(13.97,3.048) 33(16.51,-3.048) 34(16.51,3.048) 35(19.05,-3.048) 36(19.05,3.048) 37(21.59,-3.048) 38(21.59,3.048) 39(24.13,-3.048) 40(24.13,3.048)
CON_SAMTEC_TSM_104_01_DV_A
  round 1 hole 1.78 unplated: (-2.54,0) (2.54,0)
  rect 1.27x3.17 smd: 1(-3.81,-2.73) 2(-3.81,2.73) 3(-1.27,-2.73) 4(-1.27,2.73) 5(1.27,-2.73) 6(1.27,2.73) 7(3.81,-2.73) 8(3.81,2.73)
CON_SAMTEC_TSM_115_01_DV_A
  round 1 hole 1.78 unplated: (-16.51,0) (16.51,0)
  rect 1.27x3.17 smd: 1(-17.78,-2.73) 2(-17.78,2.73) 3(-15.24,-2.73) 4(-15.24,2.73) 5(-12.7,-2.73) 6(-12.7,2.73) 7(-10.16,-2.73) 8(-10.16,2.73) 9(-7.62,-2.73) 10(-7.62,2.73) 11(-5.08,-2.73) 12(-5.08,2.73) 13(-2.54,-2.73) 14(-2.54,2.73) 15(0,-2.73) 16(0,2.73) 17(2.54,-2.73) 18(2.54,2.73) 19(5.08,-2.73) 20(5.08,2.73) 21(7.62,-2.73) 22(7.62,2.73) 23(10.16,-2.73) 24(10.16,2.73) 25(12.7,-2.73) 26(12.7,2.73) 27(15.24,-2.73) 28(15.24,2.73) 29(17.78,-2.73) 30(17.78,2.73)
CRS_DO214AB_01
  rect 2x3.2 smd: 1(-3.4,0) 2(3.4,0)
FB0805_PC
  rrect 1x1.3 smd: 1(-0.95,0) 2(0.95,0)
HE10M2X10TH
  rect 1.524x1.524 hole 1.016: 1(0,0)
  round 1.524 hole 1.016: 2(0,2.54) 3(2.54,0) 4(2.54,2.54) 5(5.08,0) 6(5.08,2.54) 7(7.62,0) 8(7.62,2.54) 9(10.16,0) 10(10.16,2.54) 11(12.7,0) 12(12.7,2.54) 13(15.24,0) 14(15.24,2.54) 15(17.78,0) 16(17.78,2.54) 17(20.32,0) 18(20.32,2.54) 19(22.86,0) 20(22.86,2.54)
JACK2P_815X512_728
  round 2.69 hole 2.3: (-5.3,-5)
  round 2.39 hole 2: (-3.75,3) (3.75,3)
  round 2.49 hole 2.1: (0,-3.5) 3(0,-6.8)
  rect 2.49x2.49 hole 2.1: 1(0,3)
JEDEC_MS026_BBC_LQFP7X7_48
  round 1 smd: (-4.2,4.2) (4.2,-4.225)
  rect 0.3x1.45 smd: 1(-2.75,-4.2) 2(-2.25,-4.2) 3(-1.75,-4.2) 4(-1.25,-4.2) 5(-0.75,-4.2) 6(-0.25,-4.2) 7(0.25,-4.2) 8(0.75,-4.2) 9(1.25,-4.2) 10(1.75,-4.2) 11(2.25,-4.2) 12(2.75,-4.2) 25(2.75,4.2) 26(2.25,4.2) 27(1.75,4.2) 28(1.25,4.2) 29(0.75,4.2) 30(0.25,4.2) 31(-0.25,4.2) 32(-0.75,4.2) 33(-1.25,4.2) 34(-1.75,4.2) 35(-2.25,4.2) 36(-2.75,4.2)
  rect 1.45x0.3 smd: 13(4.2,-2.75) 14(4.2,-2.25) 15(4.2,-1.75) 16(4.2,-1.25) 17(4.2,-0.75) 18(4.2,-0.25) 19(4.2,0.25) 20(4.2,0.75) 21(4.2,1.25) 22(4.2,1.75) 23(4.2,2.25) 24(4.2,2.75) 37(-4.2,2.75) 38(-4.2,2.25) 39(-4.2,1.75) 40(-4.2,1.25) 41(-4.2,0.75) 42(-4.2,0.25) 43(-4.2,-0.25) 44(-4.2,-0.75) 45(-4.2,-1.25) 46(-4.2,-1.75) 47(-4.2,-2.25) 48(-4.2,-2.75)
L0805_PC
  rrect 1x1.3 smd: 1(-0.95,0) 2(0.95,0)
L1210
  rect 2.667x1.143 smd: 1(0,-1.499) 2(0,1.499)
LED0805
  rect 1.245x1.092 smd: 1(0,-1.173) 2(0,1.173)
OSC4SM_126X98_039
  rect 1.397x1.194 smd: 1(-1.1,-0.85) 2(1.1,-0.85) 3(1.1,0.85) 4(-1.1,0.85)
OSC-7M
  rect 1.4x1.15 smd: 1(-1.1,-0.8) 2(1.1,-0.8) 3(1.1,0.8) 4(-1.1,0.8)
OSC-9H
  rect 1.397x1.905 smd: 1(-1.55,0) 2(1.55,0)
PILE_KEYSTONE_3000_DIA12MM0
  round 10 smd: 1(0,0)
  rect 3.175x3.175 smd: 2(-7.874,0) 3(7.874,0)
QFN48_276_0197_039
  custom 1.016x0.33 smd: 1(-3.44,2.75) 12(-3.44,-2.75) 25(3.44,-2.75) 36(3.44,2.75)
  rect 1.016x0.33 smd: 2(-3.44,2.25) 3(-3.44,1.75) 4(-3.44,1.25) 5(-3.44,0.75) 6(-3.44,0.25) 7(-3.44,-0.25) 8(-3.44,-0.75) 9(-3.44,-1.25) 10(-3.44,-1.75) 11(-3.44,-2.25) 26(3.44,-2.25) 27(3.44,-1.75) 28(3.44,-1.25) 29(3.44,-0.75) 30(3.44,-0.25) 31(3.44,0.25) 32(3.44,0.75) 33(3.44,1.25) 34(3.44,1.75) 35(3.44,2.25)
  custom 0.33x1.016 smd: 13(-2.75,-3.44) 24(2.75,-3.44) 37(2.75,3.44) 48(-2.75,3.44)
  rect 0.33x1.016 smd: 14(-2.25,-3.44) 15(-1.75,-3.44) 16(-1.25,-3.44) 17(-0.75,-3.44) 18(-0.25,-3.44) 19(0.25,-3.44) 20(0.75,-3.44) 21(1.25,-3.44) 22(1.75,-3.44) 23(2.25,-3.44) 38(2.25,3.44) 39(1.75,3.44) 40(1.25,3.44) 41(0.75,3.44) 42(0.25,3.44) 43(-0.25,3.44) 44(-0.75,3.44) 45(-1.25,3.44) 46(-1.75,3.44) 47(-2.25,3.44)
  rect 5.15x5.15 smd: 49(0,0)
R0603_PC
  oval 0.914x0.762 smd: 1(-0.686,0) 2(0.686,0)
RN0402
  rect 0.3x0.7 smd: 1(-0.75,-0.575) 2(-0.25,-0.575) 3(0.25,-0.575) 4(0.75,-0.575) 5(0.75,0.575) 6(0.25,0.575) 7(-0.25,0.575) 8(-0.75,0.575)
RN0603
  rect 0.508x1.092 smd: 1(-1.2,-0.9) 4(1.2,-0.9) 5(1.2,0.9) 8(-1.2,0.9)
  rect 0.406x1.092 smd: 2(-0.4,-0.9) 3(0.4,-0.9) 6(0.4,0.9) 7(-0.4,0.9)
SM_5_SOT23_70H
  rect 0.711x0.991 smd: 1(-0.95,-1.2) 2(0,-1.2) 3(0.95,-1.2) 4(0.95,1.2) 5(-0.95,1.2)
SO8
  rect 0.6x2.2 smd: 1(-1.905,-2.6) 2(-0.635,-2.6) 3(0.635,-2.6) 4(1.905,-2.6) 5(1.905,2.6) 6(0.635,2.6) 7(-0.635,2.6) 8(-1.905,2.6)
SO16
  rect 0.6x2.2 smd: 1(-4.445,-2.6) 2(-3.175,-2.6) 3(-1.905,-2.6) 4(-0.635,-2.6) 5(0.635,-2.6) 6(1.905,-2.6) 7(3.175,-2.6) 8(4.445,-2.6) 9(4.445,2.6) 10(3.175,2.6) 11(1.905,2.6) 12(0.635,2.6) 13(-0.635,2.6) 14(-1.905,2.6) 15(-3.175,2.6) 16(-4.445,2.6)
